# Altium PCB CM5_RP2040_MZM.PcbDoc (part 1 of 5)
Units mil, origin at the board's own origin, x right, y up, seen from the top; angles counter-clockwise.
Board outline 4724.41 x 3543.31 mil, 4 copper layers (Top Layer, GND L2, GND L3, Bottom Layer), stack 62.992 mil thick; 227 components, 122 nets, 905 pads, 3083 vias.
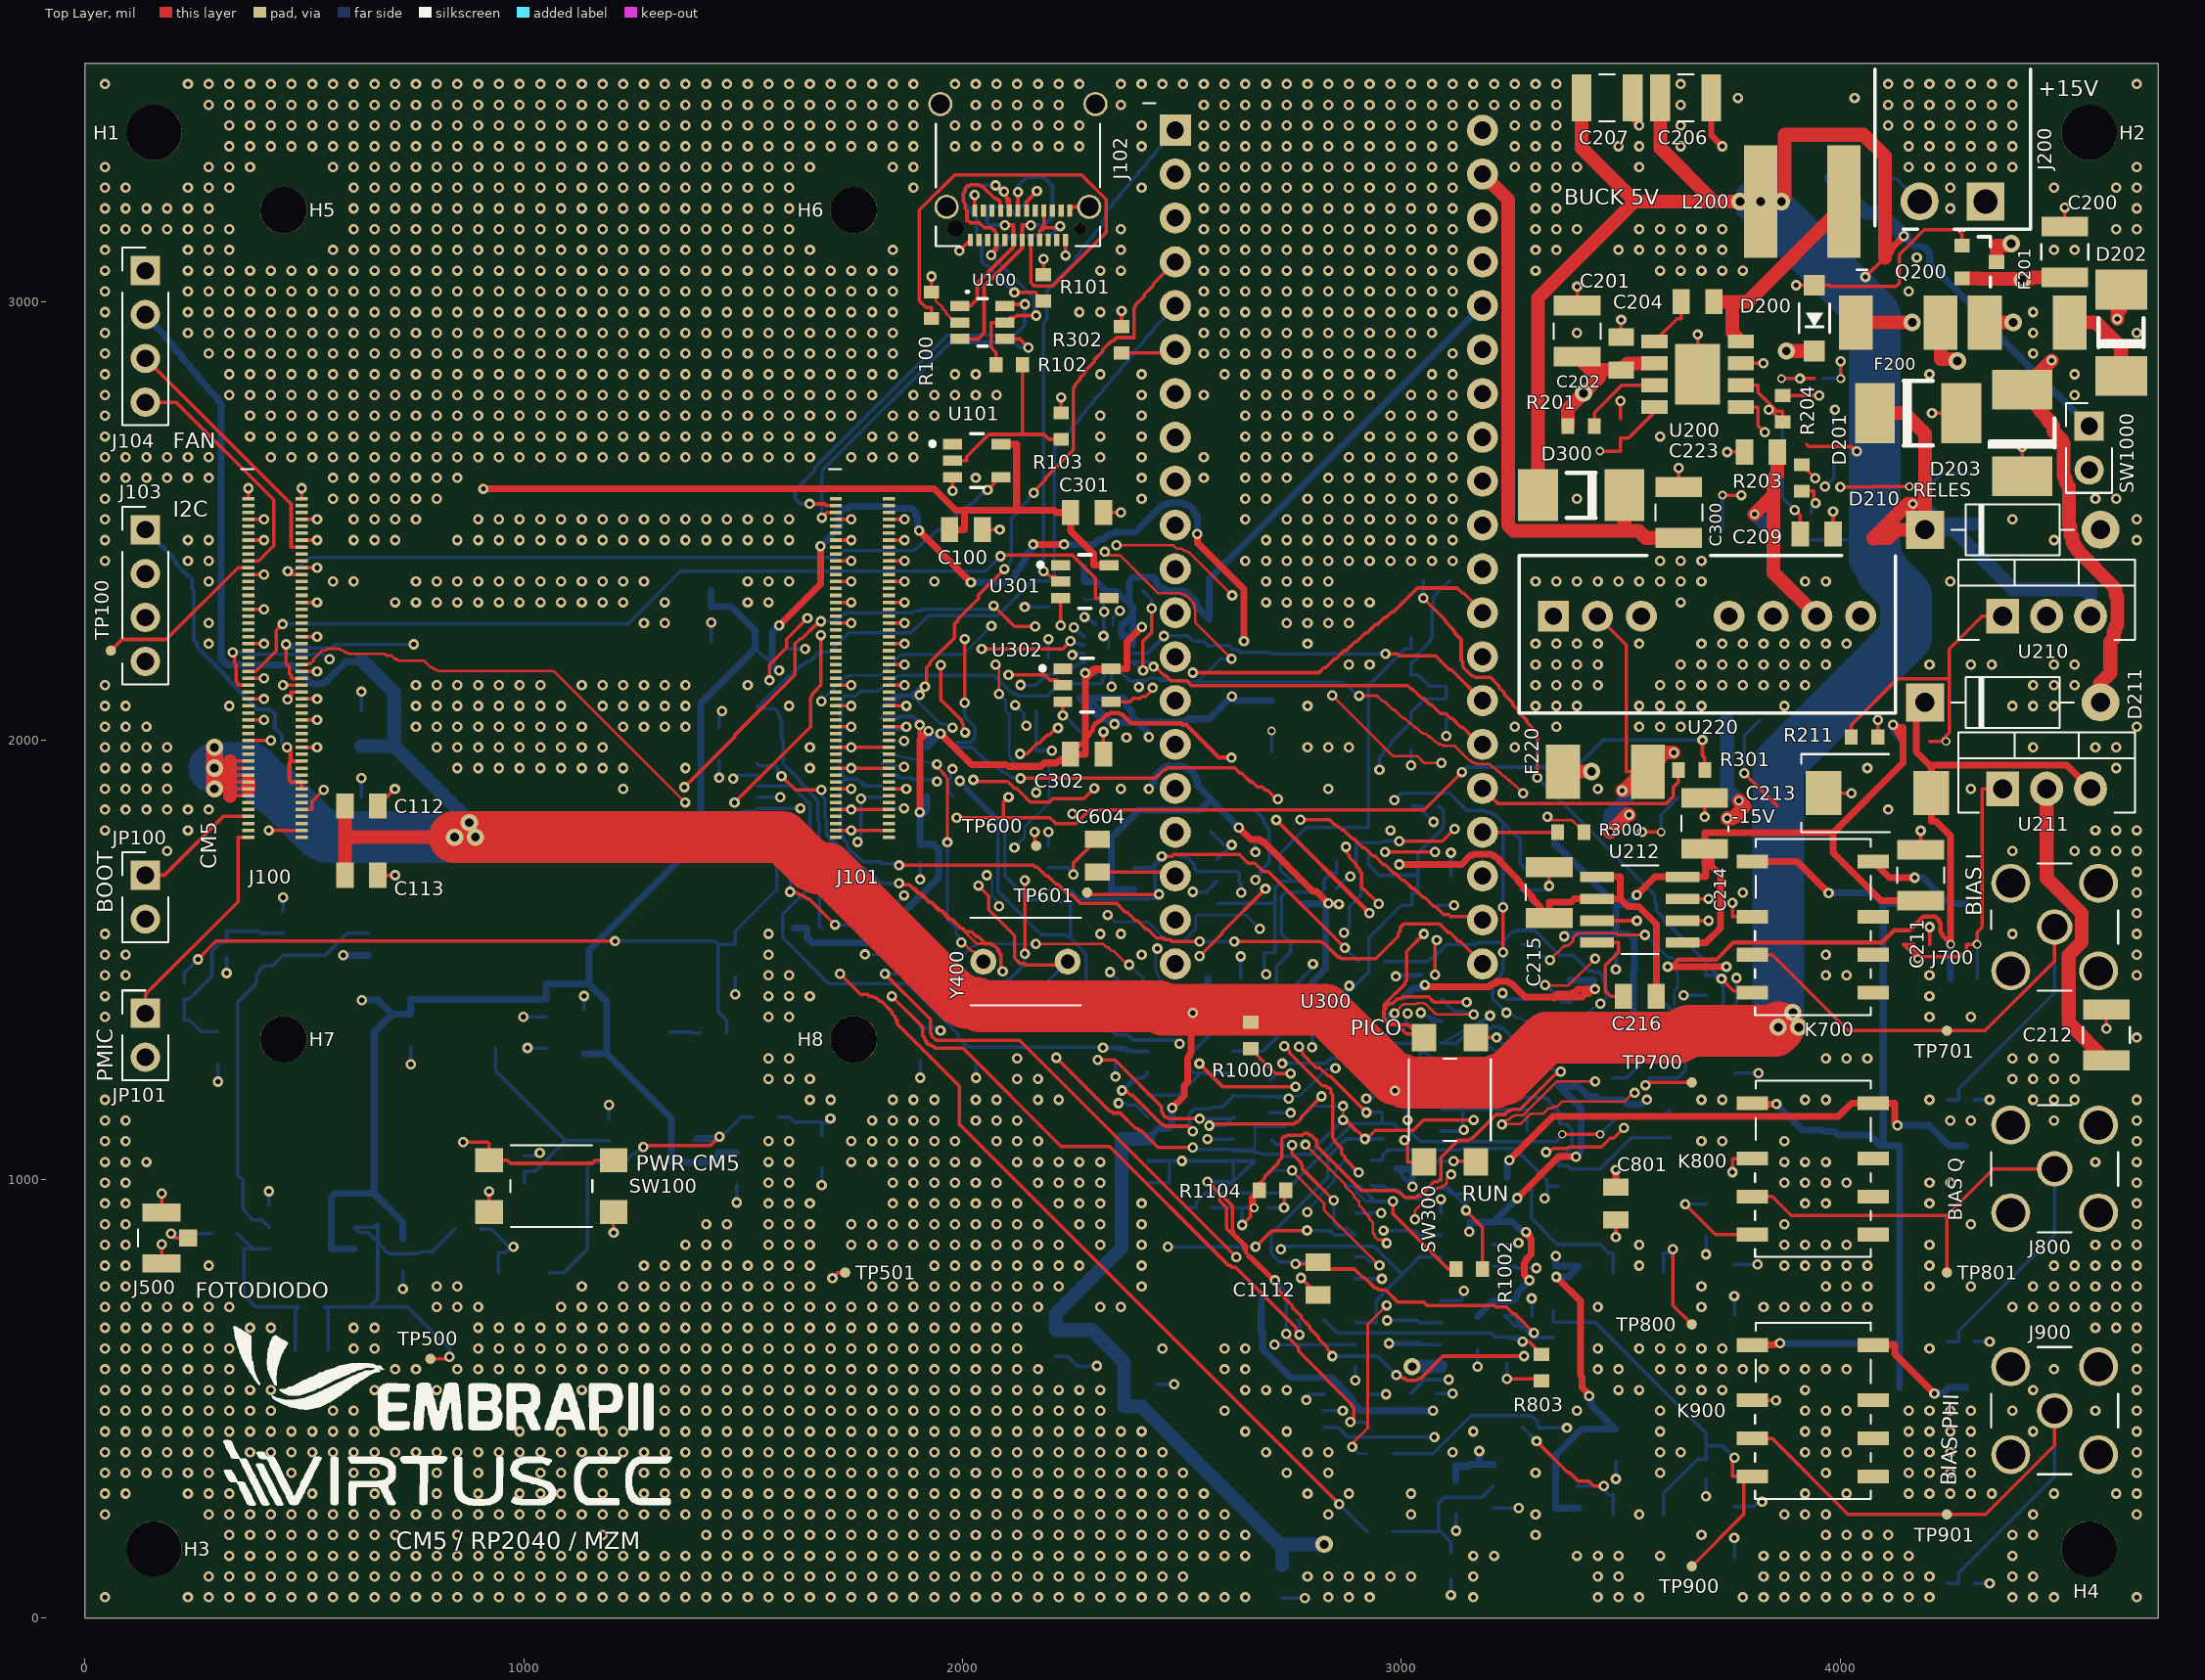
[diagram p0: Top Layer view]
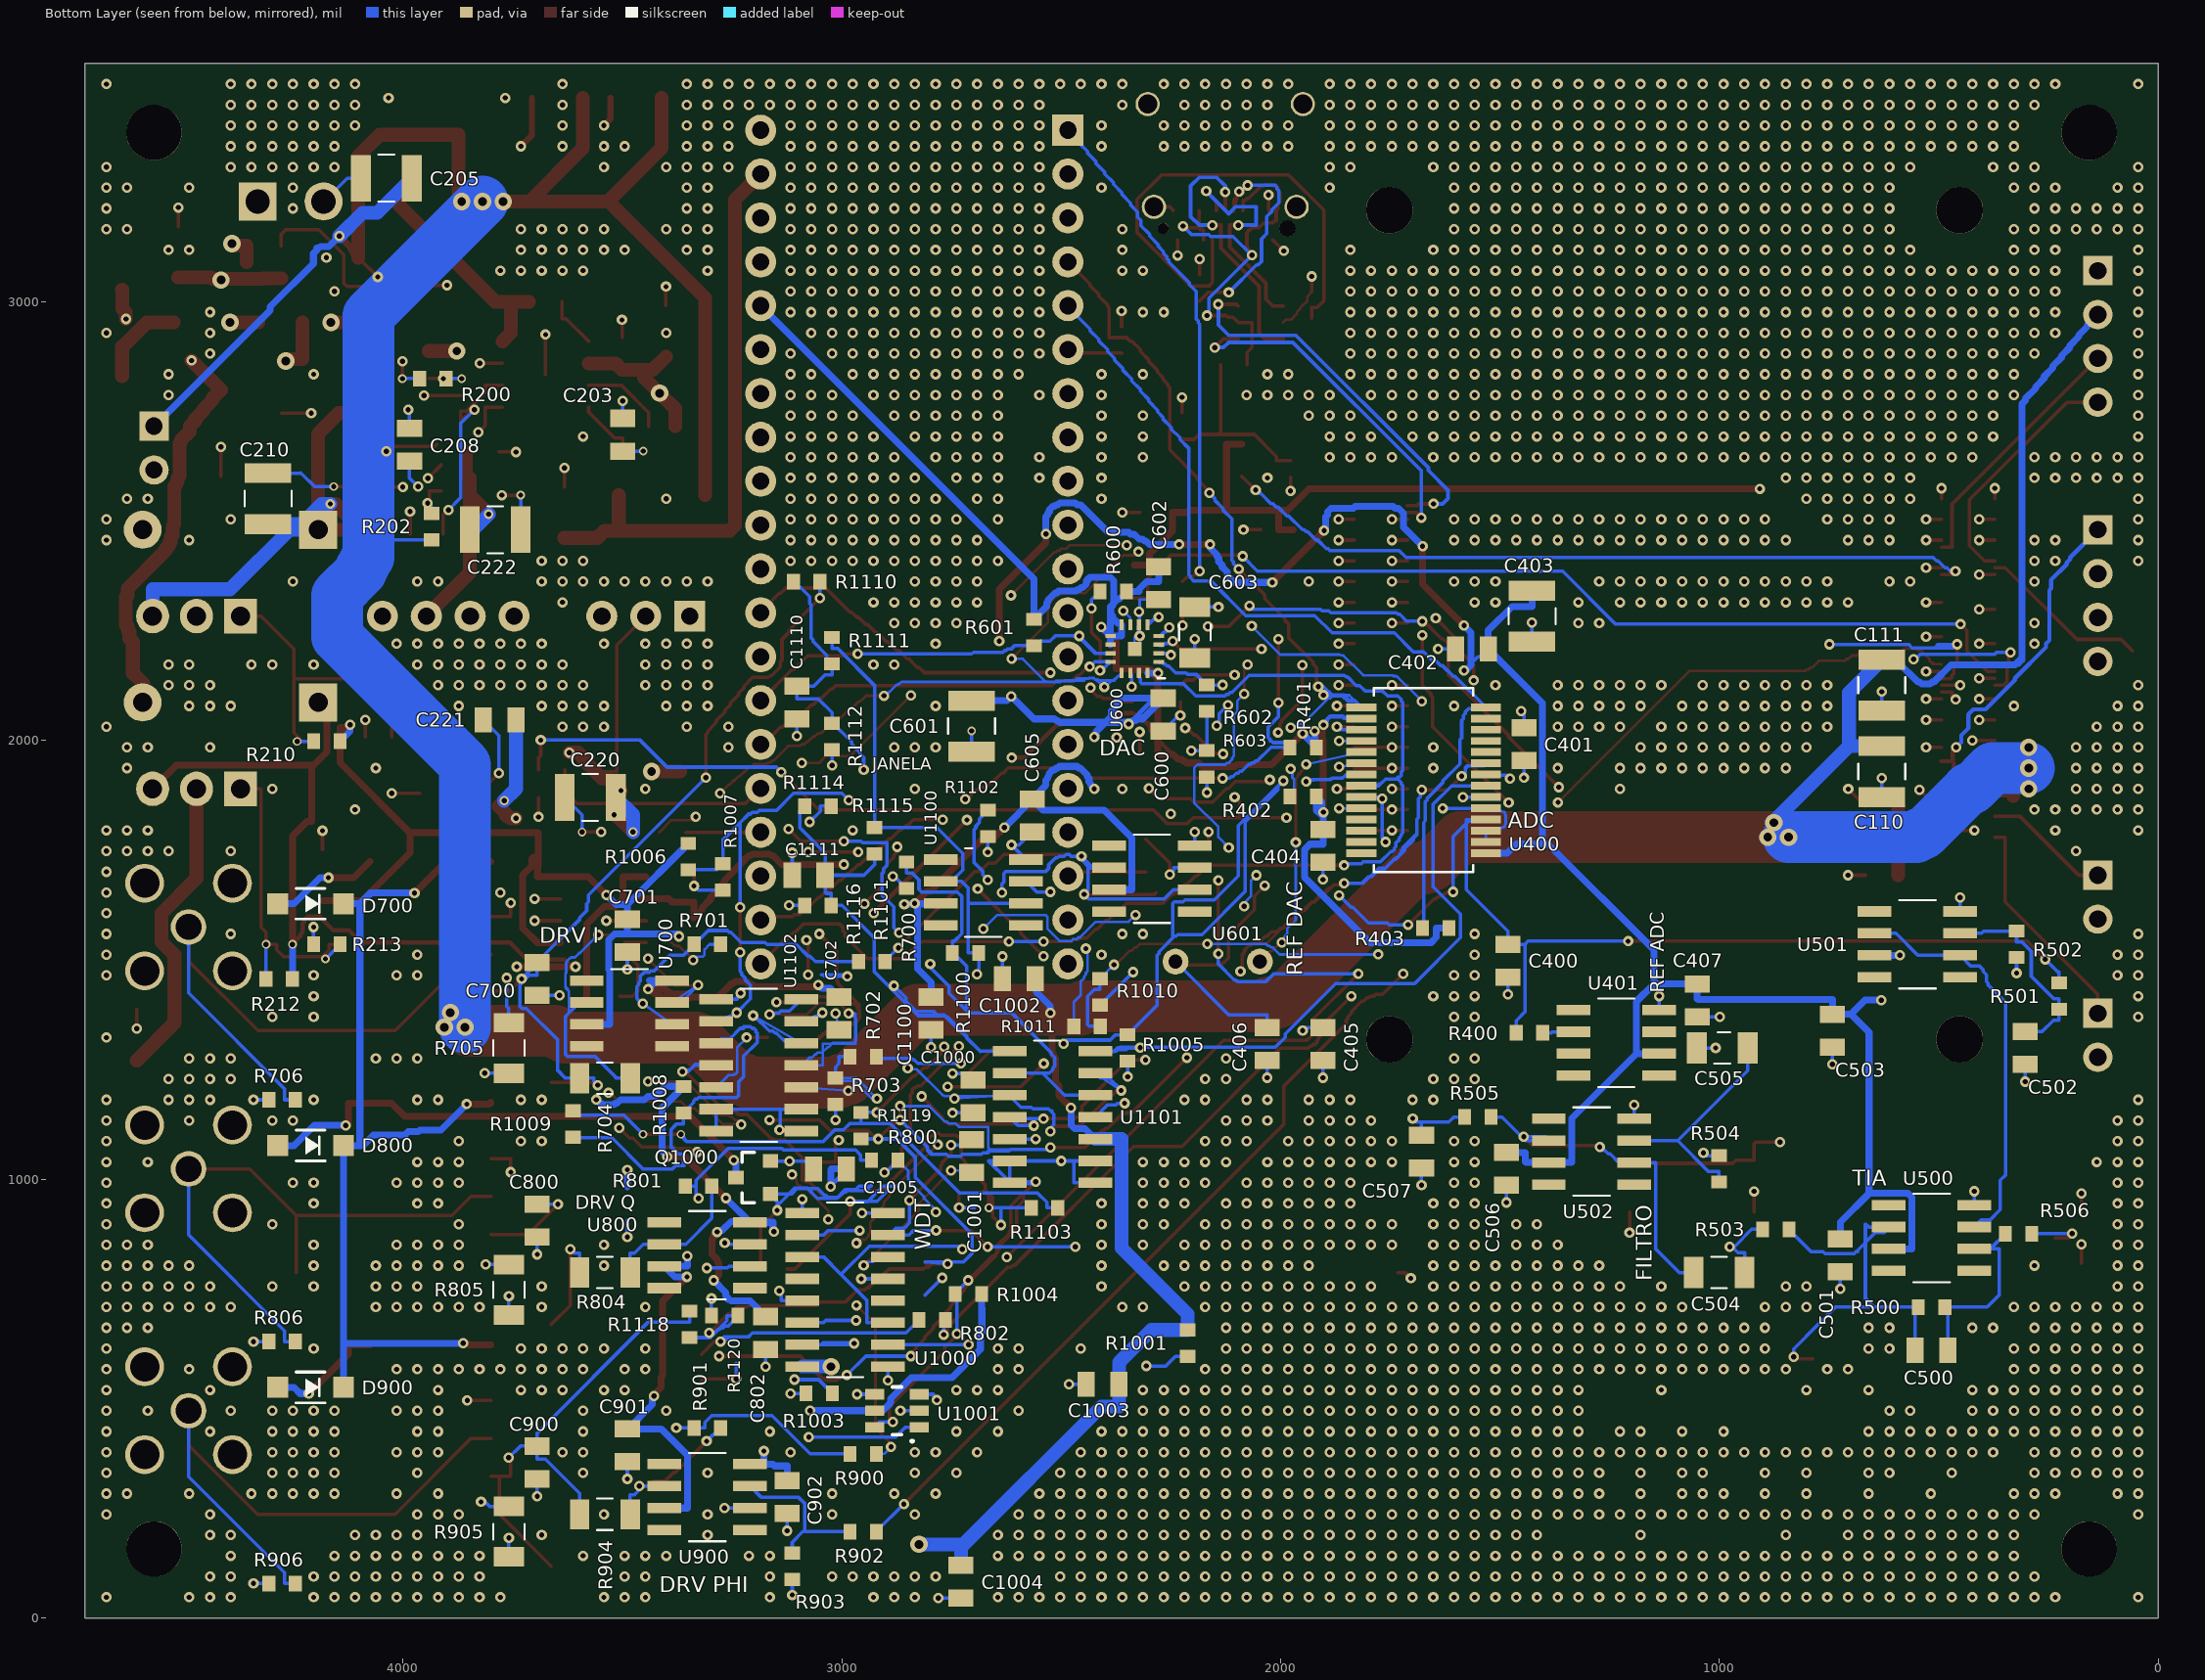
[diagram p1: Bottom Layer view, seen from below]
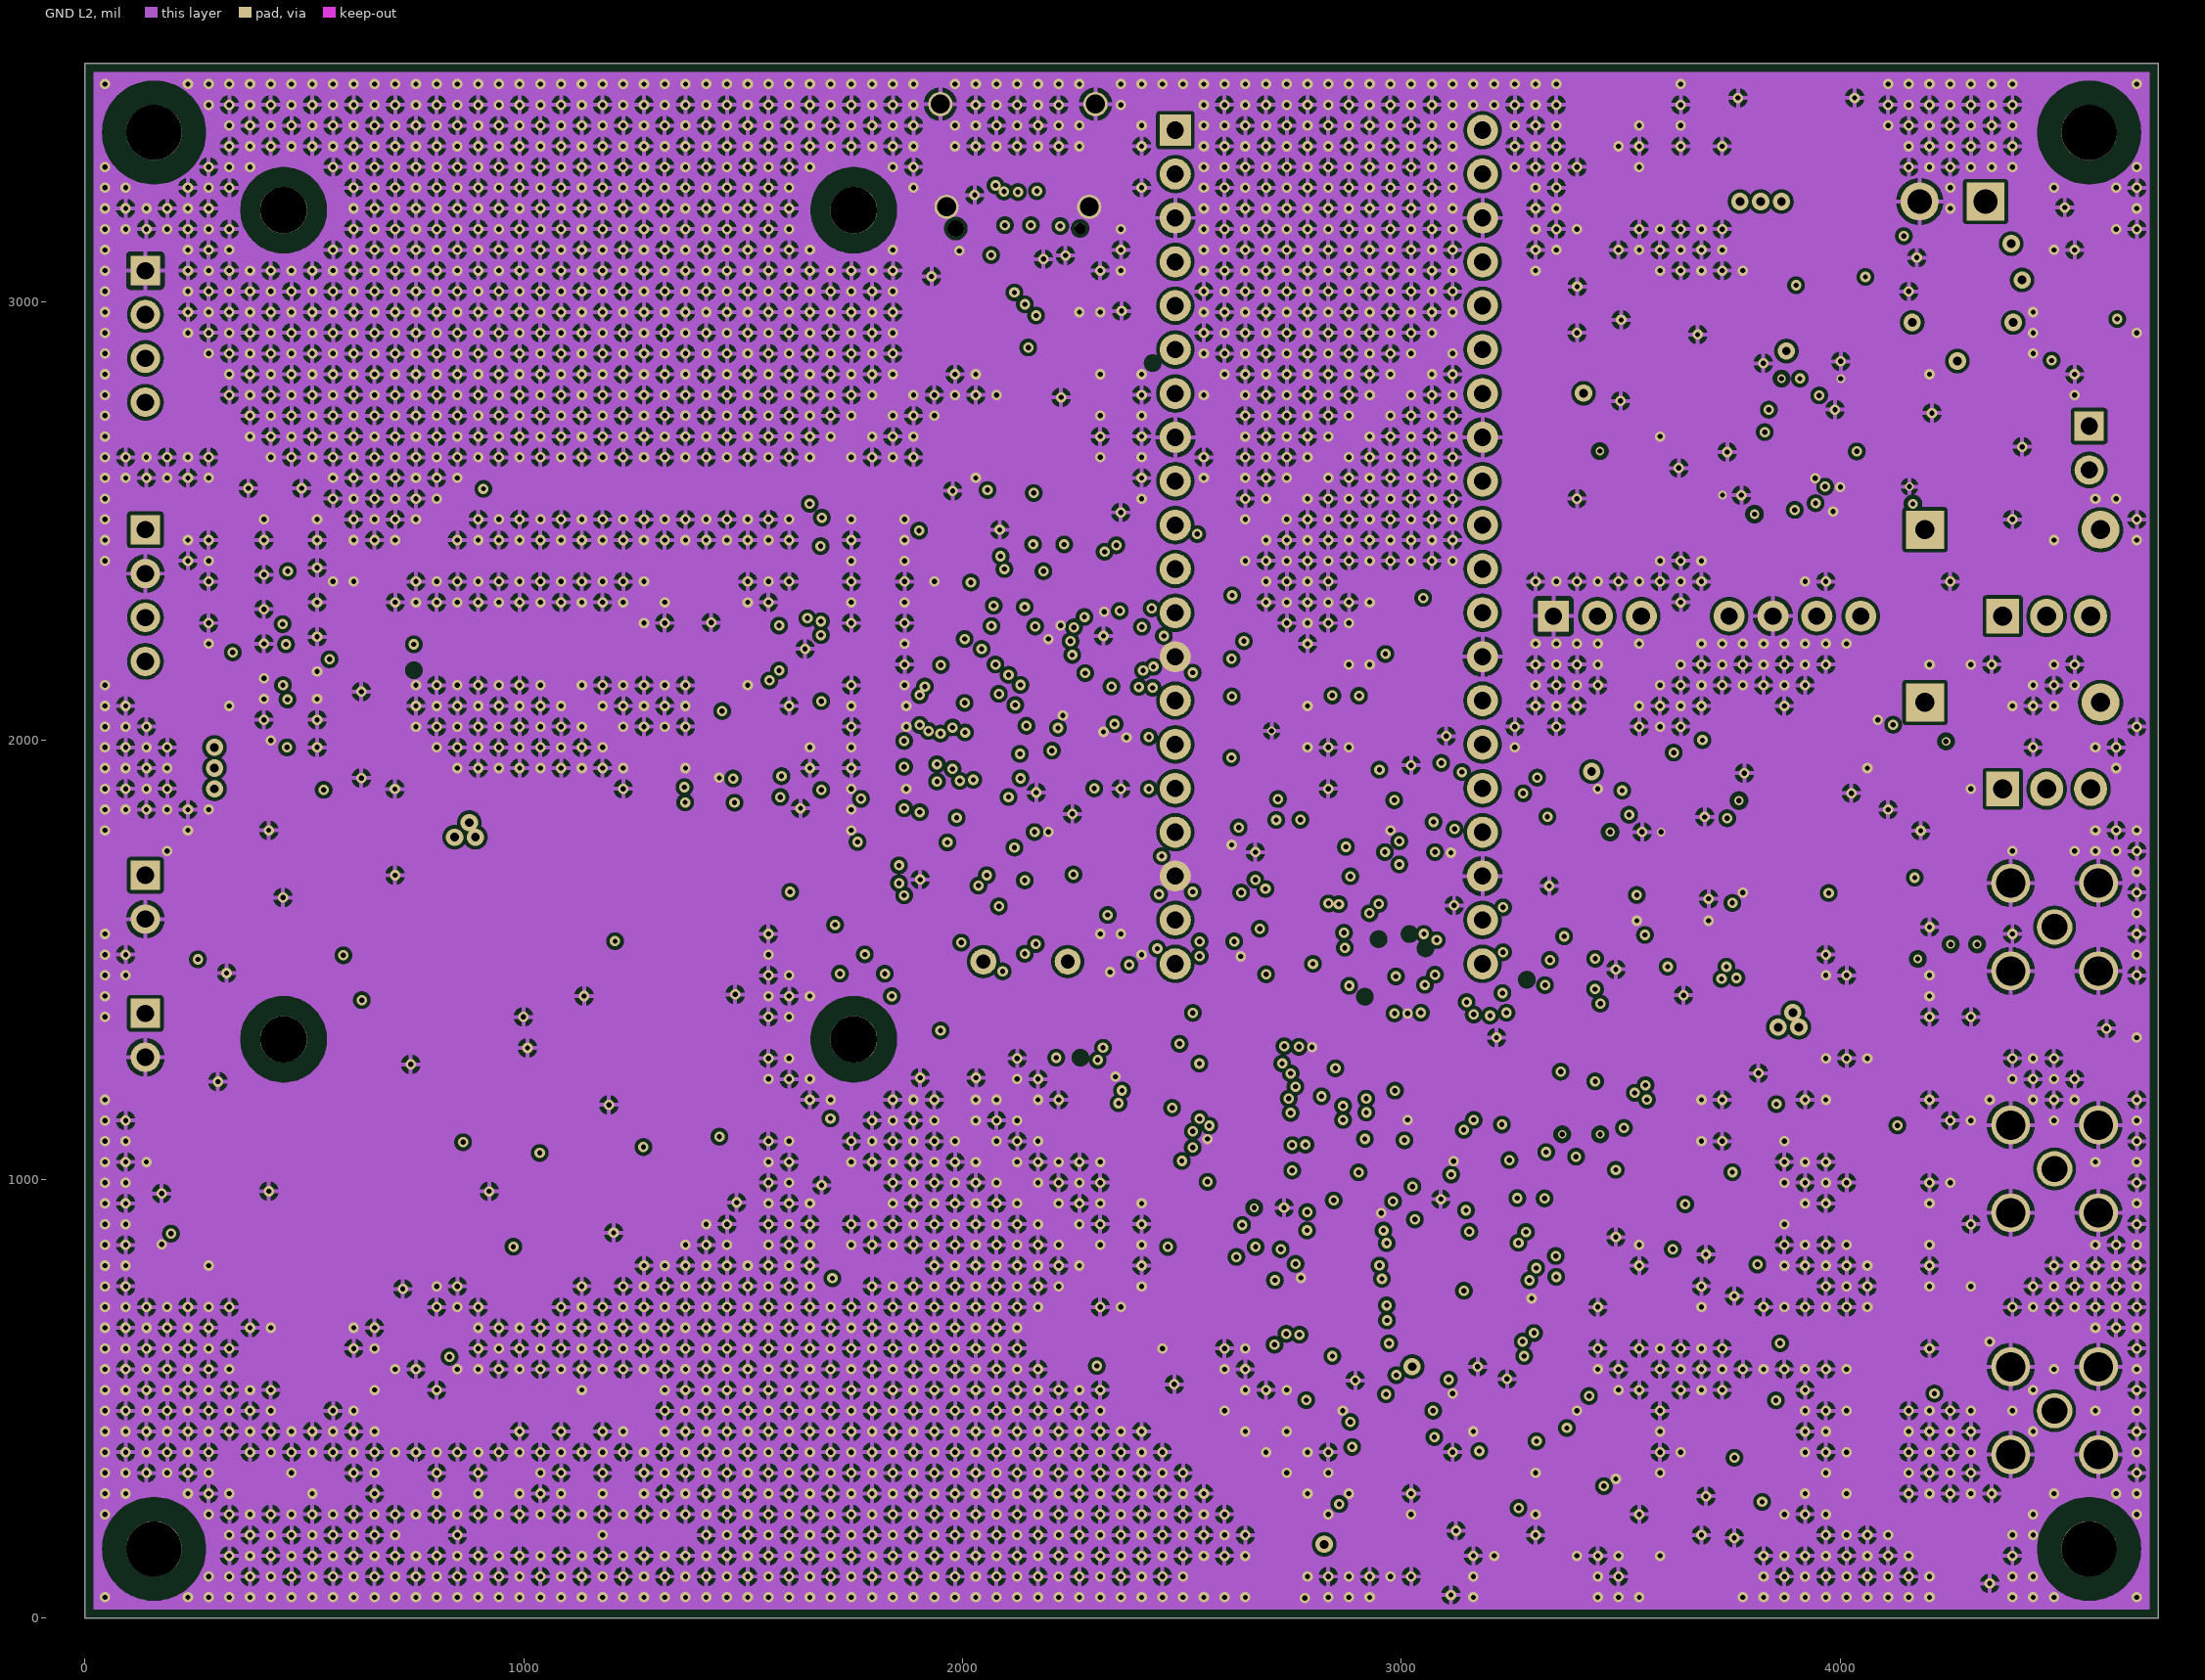
[diagram p2: GND L2]
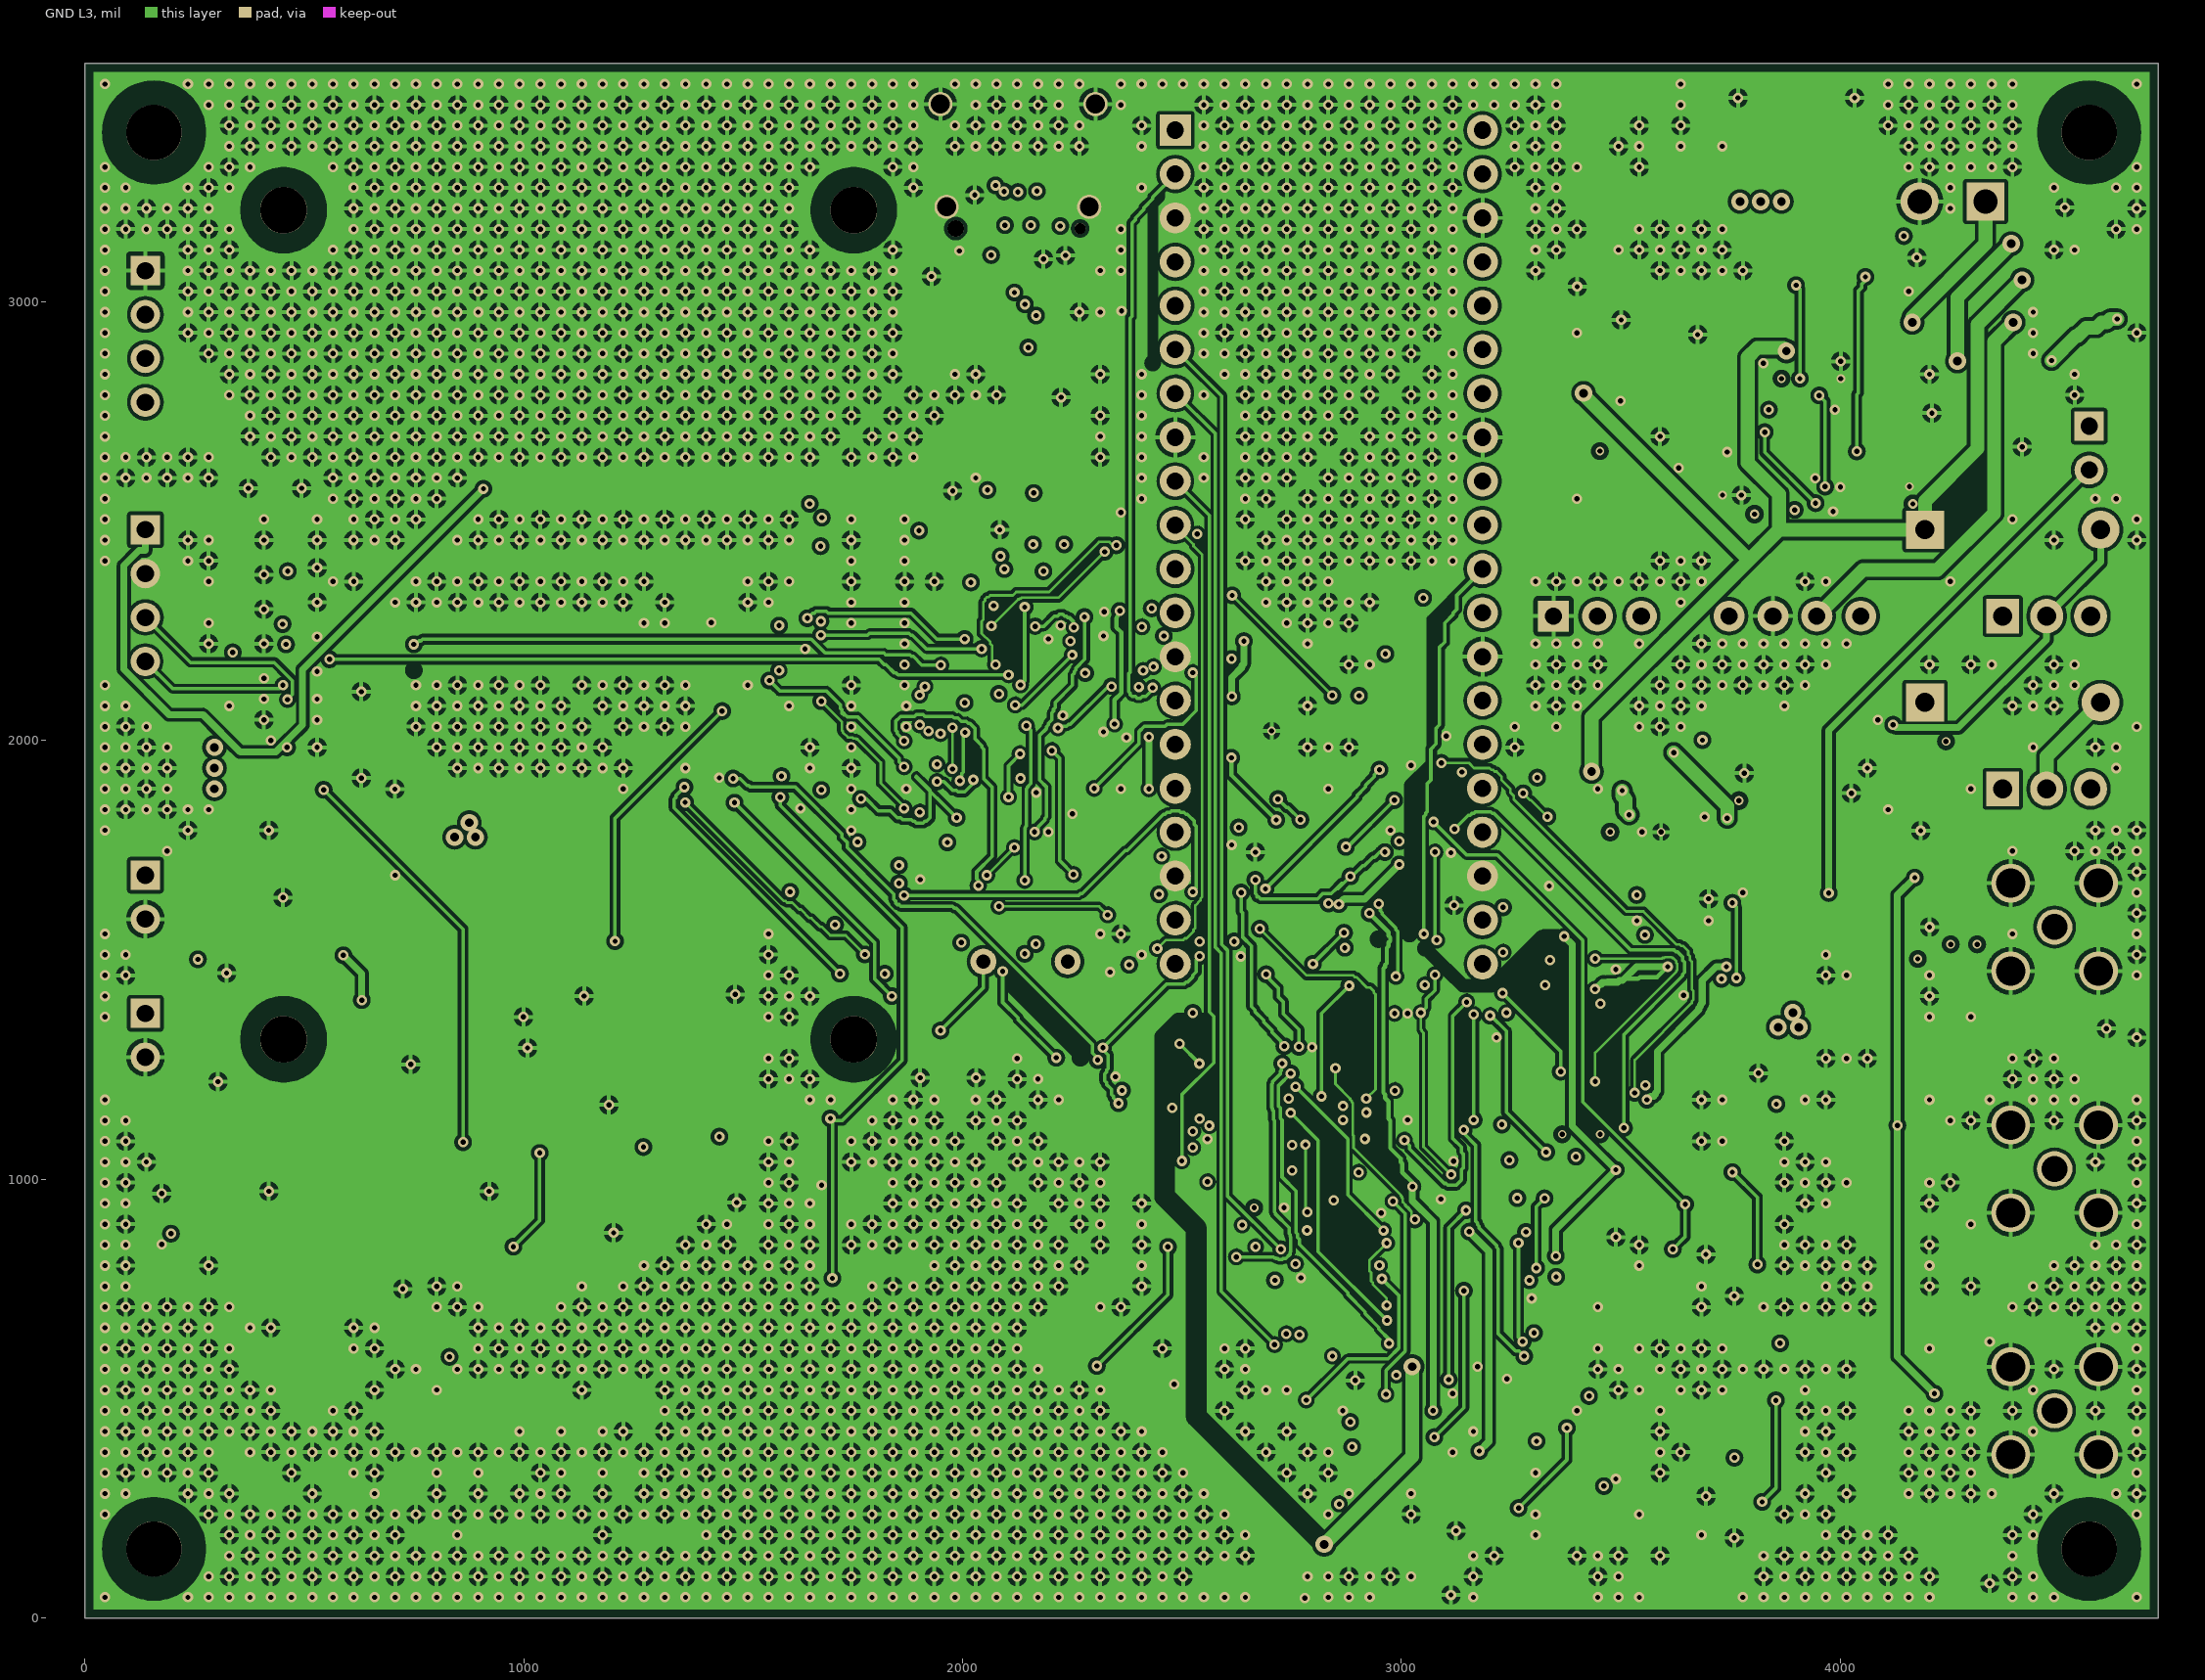
[diagram p3: GND L3]

## Layer stack, top to bottom
Top Solder: solder mask 0.4, Solder Resist, Dk 3.5
Top Layer: signal copper 1.378
Prepreg L1-L2: dielectric 5.9055, FR-4, Dk 4.2
GND L2: signal copper 1.378
Dielectric 1: dielectric 45.6693, FR-4, Dk 4.2
GND L3: signal copper 1.378
Prepreg L3-L4: dielectric 5.9055, FR-4, Dk 4.2
Bottom Layer: signal copper 1.378
Bottom Solder: solder mask 0.4, Solder Resist, Dk 3.5

## Board outline
0,3543.31 4724.41,3543.31 4724.41,0 0,0

## Design rules (kind name [scope] priority, off if disabled: settings)
Clearance Clearance_0_15mm [All] p1: gap=5.91 ignorepadtopadclearanceinfootprint=TRUE
DiffPairsRouting USB_R8_022_018 [InDifferentialPair('USB_CM5') Or InDifferentialPair('USB_EXT')] p1: maxlimit=8.66 minlimit=5.91 mostfreqgap=7.09 toplayer_minwidth=8.66 toplayer_maxwidth=8.66 toplayer_prefwidth=8.66 midlayer1_minwidth=8.66 midlayer1_maxwidth=8.66 midlayer1_prefwidth=8.66 midlayer2_minwidth=8.66 midlayer2_maxwidth=8.66 midlayer2_prefwidth=8.66 bottomlayer_minwidth=8.66 bottomlayer_maxwidth=8.66 bottomlayer_prefwidth=8.66 maxuncoupledlength=500
HoleSize Hole_Mounting_NPTH [IsPad And (PadIsPlated = 'False') And (AsMM(HoleSize) > 2.54)] p1: absolutevalues=TRUE maxlimit=126.02 minlimit=106.26 maxpercent=100.000 minpercent=0.000 // R6
HoleSize Hole_Default [Not (IsPad And (PadIsPlated = 'False') And (AsMM(HoleSize) > 2.54))] p2: absolutevalues=TRUE maxlimit=100 minlimit=1 maxpercent=80.000 minpercent=20.000 // R6
MinimumSolderMaskSliver Mask_FinePitch_010mm [InComponent('J100') OR InComponent('J101') OR InComponent('J102') OR InComponent('U400') OR InComponent('U600')] p1: minsoldermaskwidth=3.94 // R6
MinimumSolderMaskSliver Mask_Default_0254mm [All] p2: minsoldermaskwidth=10 // R6
PolygonConnect [All] p1: connectstyle=Relief reliefconductorwidth=10 reliefentries=4 polygonreliefangle="90 Angle" airgapwidth=10
RoutingVias Via_060_030 [All] p1: holewidth=11.81 width=23.62 viastyle="Through Hole" minholewidth=9.84 minwidth=21.65 maxholewidth=23.62 maxwidth=47.24
SolderMaskExpansion Mask_Vias_Tented [IsVia] p1: expansion=-39.37 istentingtop=TRUE // R6
SolderMaskExpansion [All] p2: expansion=4 istentingtop=FALSE
Width Width_Default [All] p1: maxlimit=196.85 minlimit=5.91 preferedwidth=7.87
27 further rules are at their usual default settings.

## Classes and differential pairs
differential pair USB_CM5: +CM5_USB_P -CM5_USB_N
differential pair USB_EXT: +USB_DP_EXT -USB_DN_EXT

## Components (designator, comment, footprint, x,y, rotation, side; value= is the part's Value field where it differs from the comment)
C100 "100 nF / 50 V X7R" C0805#1 2007.87,2480.31 r0 top
C110 "47 uF / 10 V X7R" C1210#1 629.92,1929.13 r90 bottom
C111 "47 uF / 10 V X7R" C1210#1 629.92,2125.98 r90 bottom
C112 "100 nF / 50 V X7R" C0805#1 629.92,1850.39 r0 top
C113 "100 nF / 50 V X7R" C0805#1 629.92,1692.91 r0 top
C200 "10 uF / 50 V X7R" C1210#2 4511.42,3113.39 r90 top
C201 "10 uF / 50 V X7R" C1210#2 3400.39,2933.07 r90 top
C202 "100 nF / 50 V X7R" C0805#1 3500.59,2881.89 r90 top
C203 "10 nF / 50 V X7R" C0805#2 3499.21,2696.85 r270 bottom
C204 "100 nF / 50 V X7R" C0805#1 3674.8,3000 r0 top
C205 "22 uF / 25 V X7R" C1210#1 4037.4,3281.5 r180 bottom
C206 "22 uF / 25 V X7R" C1210#2 3647.64,3464.57 r0 top
C207 "22 uF / 25 V X7R" C1210#2 3468.5,3464.57 r0 top
C208 "2.7 nF / 50 V C0G" C0805#2 3984.65,2674.02 r270 bottom
C209 "33 pF / 50 V C0G" C0805#1 3946.06,2470.47 r0 top
C210 "10 uF / 50 V X7R" C1210#1 4307.09,2551.18 r270 bottom
C211 "10 uF / 50 V X7R" C1210#2 4183.07,1692.91 r90 top
C212 "10 uF / 50 V X7R" C1210#2 4606.3,1328.74 r90 top
C213 "10 uF / 35 V tantalum" TANT_D 4084.65,1879.92 r0 top
C214 "10 uF / 50 V X7R" C1210#2 3690.94,1811.02 r90 top
C215 "10 uF / 50 V X7R" C1210#2 3336.61,1653.54 r90 top
C216 "10 nF / 50 V C0G" C0805#1 3543.31,1417.32 r0 top
C220 "Comment" C1210#1 3572.83,1870.08 r180 bottom
C221 "Comment" C0805#2 3779.53,2047.24 r180 bottom
C222 "Comment" C1210#1 3789.37,2480.31 r180 bottom
C223 "Comment" C0805#1 3818.9,2657.48 r0 top
C300 "10 uF / 50 V X7R" C1210#2 3631.89,2519.68 r90 top
C301 "100 nF / 50 V X7R" C0805#1 2283.46,2519.68 r0 top
C302 "100 nF / 50 V X7R" C0805#1 2283.46,1968.5 r0 top
C400 "1 uF / 25 V X7R" C0805#2 1481.81,1498.03 r90 bottom
C401 "100 nF / 50 V X7R" C0805#2 1445.45,1991.73 r90 bottom
C402 "100 nF / 50 V X7R" C0805#2 1564.13,2208.66 r180 bottom
C403 "10 uF / 50 V X7R" C1210#1 1426.93,2283.46 r90 bottom
C404 "100 nF / 50 V X7R" C0805#2 1903.27,1759.84 r90 bottom
C405 "27 pF / 50 V C0G" C0805#2 1903.27,1308.07 r90 bottom
C406 "27 pF / 50 V C0G" C0805#2 2030.63,1308.07 r90 bottom
C407 "100 nF / 50 V X7R" C0805#2 1050.51,1407.48 r90 bottom
C500 "100 pF / 50 V C0G" C0805#2 516.54,610.24 r180 bottom
C501 "100 nF / 50 V X7R" C0805#2 724.41,826.77 r90 bottom
C502 "1 uF / 25 V X7R" C0805#2 303.15,1299.21 r90 bottom
C503 "100 nF / 50 V X7R" C0805#2 742.52,1338.58 r90 bottom
C504 "100 nF / 50 V C0G" C1206 1000.79,787.4 r180 bottom
C505 "47 nF / 50 V C0G" C1206 993.7,1299.21 r180 bottom
C506 "100 nF / 50 V X7R" C0805#2 1485.04,1023.62 r90 bottom
C507 "10 nF / 50 V C0G" C0805#2 1678.74,1062.99 r90 bottom
C600 "100 nF / 50 V X7R" C0805#2 2267.46,2059.05 r90 bottom
C601 "10 uF / 50 V X7R" C1210#1 2704.06,2032.68 r90 bottom
C602 "100 nF / 50 V X7R" C0805#2 2277.6,2358.27 r90 bottom
C603 "150 nF / 50 V X7R" C1206 2195.28,2246.06 r90 bottom
C604 "1 uF / 25 V X7R" C0805#1 2306.85,1737.8 r270 top
C605 "100 nF / 50 V X7R" C0805#2 2566.02,1828.74 r90 bottom
C700 "1 uF / 25 V X7R" C0805#2 3693.7,1456.69 r90 bottom
C701 "100 nF / 50 V X7R" C0805#2 3488.39,1555.12 r90 bottom
C702 "100 nF / 50 V X7R" C0805#2 3006.1,1377.95 r90 bottom
C800 "1 uF / 25 V X7R" C0805#2 3693.7,905.51 r90 bottom
C801 "100 nF / 50 V X7R" C0805#1 3488.39,944.88 r270 top
C802 "100 nF / 50 V X7R" C0805#2 3173.43,649.61 r90 bottom
C900 "1 uF / 25 V X7R" C0805#2 3693.7,354.33 r90 bottom
C901 "100 nF / 50 V X7R" C0805#2 3488.39,393.7 r90 bottom
C902 "100 nF / 50 V X7R" C0805#2 3124.21,275.59 r90 bottom
C1000 "1 uF / 25 V X7R" C0805#2 2700.39,1188.58 r90 bottom
C1001 "1 uF / 25 V X7R" C0805#2 2703.84,1053.15 r90 bottom
C1002 "100 nF / 50 V X7R" C0805#2 2596.46,1456.69 r180 bottom
C1003 "100 nF / 50 V X7R" C0805#2 2405.51,532.48 r180 bottom
C1004 "100 nF / 50 V X7R" C0805#2 2728.35,82.68 r90 bottom
C1005 "100 nF / 50 V X7R" C0805#2 3026.87,1023.62 r180 bottom
C1100 "100 nF / 50 V X7R" C0805#2 2796.06,1377.95 r90 bottom
C1110 "1 nF / 50 V C0G" C0805#2 3101.97,2086.61 r90 bottom
C1111 "1 nF / 50 V C0G" C0805#2 3075.2,1692.91 r180 bottom
C1112 "1 nF / 50 V C0G" C0805#1 2809.84,773.62 r270 top
D200 "BZT52C12 / zener 12 V" SOD-123#1 3940.94,2962.6 r90 top
D201 "SMBJ18A / TVS" DO-214AA 4177.17,2746.25 r0 top
D202 "B340A / 3 A 40 V" DO-214AC 4639.76,2929.13 r90 top
D203 "SMBJ18A / TVS" DO-214AA 4414.38,2700.79 r90 top
D210 "1N4007" D_DO41_P10 4192.91,2480.31 r0 top
D211 "1N4007" D_DO41_P10 4192.91,2086.61 r0 top
D300 "SS14" DO-214AC 3409.55,2559.05 r180 top
D700 "1N4148W / flyback" SOD-123#2 4210.24,1627.95 r180 bottom
D800 "1N4148W / flyback" SOD-123#2 4210.24,1076.76 r180 bottom
D900 "1N4148W / flyback" SOD-123#2 4210.24,525.58 r180 bottom
F200 "T3 A / 125 V" FUSE_NANO2 4131.89,2952.76 r0 top
F201 "F250 mA / 125 V" FUSE_NANO2 4425.79,2952.76 r0 top
F220 "Comment" FUSE_NANO2 3464.57,1929.13 r0 top
H1 "M3 NPTH" NPTH_M3_3.2mm 157.48,3385.83 r0 top
H2 "M3 NPTH" NPTH_M3_3.2mm 4566.93,3385.83 r0 top
H3 "M3 NPTH" NPTH_M3_3.2mm 157.48,157.48 r0 top
H4 "M3 NPTH" NPTH_M3_3.2mm 4566.93,157.48 r0 top
H5 "CM5 M2.5 NPTH" NPTH_CM5_M2.5_2.7mm 452.76,3208.66 r0 top
H6 "CM5 M2.5 NPTH" NPTH_CM5_M2.5_2.7mm 1751.97,3208.66 r0 top
H7 "CM5 M2.5 NPTH" NPTH_CM5_M2.5_2.7mm 452.76,1318.9 r0 top
H8 "CM5 M2.5 NPTH" NPTH_CM5_M2.5_2.7mm 1751.97,1318.9 r0 top
J100 "CM5 carrier / 100 vias" CM5_BERG100 433.07,2165.35 r0 top
J101 "CM5 carrier / 100 vias" CM5_BERG100 1771.65,2165.35 r0 top
J102 "USB-C / 12401610E4#2A" USB_C_12401610 2125.98,3338.58 r180 top
J103 "I2C / display opcional" HDR_1X04_P254 137.8,2480.31 r0 top
J104 "FAN / 5 V" HDR_1X04_P254 137.8,3070.87 r0 top
J200 "5444262 / 2 vias" 5444262 4330.71,3228.35 r180 top
J500 "U.FL / sinal eletrico" HIROSE_UFL 193.5,866.14 r180 top
J700 "SMA / DC BIAS" SMA_132134 4488.19,1574.8 r0 top
J800 "SMA / DC BIAS" SMA_132134 4488.19,1023.62 r0 top
J900 "SMA / DC BIAS" SMA_132134 4488.19,472.44 r0 top
JP100 "BOOT / ABERTO" HDR_1X02_P254 137.8,1692.91 r0 top
JP101 "KILL / ABERTO" HDR_1X02_P254 137.8,1377.95 r0 top
K700 "G6K-2F-Y DC5" G6K_2F_Y 3937.01,1574.8 r0 top
K800 "G6K-2F-Y DC5" G6K_2F_Y 3937.01,1023.62 r0 top
K900 "G6K-2F-Y DC5" G6K_2F_Y 3937.01,472.44 r0 top
L200 "3.3 uH / XAL7070-332MEC" XAL7070 3913.39,3228.35 r180 top
Q200 "DMP4065S-7" ONSC-SOT-23-3-318-08_V#1 4316.54,3090.55 r0 top
Q1000 "AO3400A" ONSC-SOT-23-3-318-08_V#2 3201.57,1003.94 r180 bottom
R100 "5.1k / 1%" R-0603#1 1929.13,2992.13 r90 top
R101 "5.1k / 1%" R-0603#1 2184.05,3031.5 r90 top
R102 "10k / 1%" R-0603#1 2106.3,2856.35 r0 top
R103 "100k / 1%" R-0603#1 2224.41,2716.54 r90 top
R200 "100k / 1%" R-0603#2 3931.5,2824.8 r180 bottom
R201 "100k / 1%" R-0603#1 3409.45,2716.54 r0 top
R202 "118k / 0.1%" R-0603#2 3934.25,2487.4 r270 bottom
R203 "22.1k / 0.1%" R-0603#1 3912.2,2598.43 r90 top
R204 "15.8k / 1%" R-0603#1 3868.5,2755.91 r90 top
R210 "120R / 0.1%" R-0603#2 4173.23,1998.03 r180 bottom
R211 "931R / 0.1%" R-0603#1 4055.12,2007.87 r0 top
R212 "120R / 0.1%" R-0603#2 4281.5,1456.69 r180 bottom
R213 "931R / 0.1%" R-0603#2 4173.23,1535.43 r180 bottom
R300 "33R / 1%" R-0603#1 3385.53,1790.94 r0 top
R301 "33R / 1%" R-0603#1 3661.12,1932.68 r0 top
R302 "47k / 1%" R-0603#1 2362.2,2913.39 r90 top
R400 "0R / jumper" R-0603#2 1433.03,1333.46 r180 bottom
R401 "10k / 1%" R-0603#2 1948.31,1984.25 r180 bottom
R402 "10k / 1%" R-0603#2 1948.31,1872.05 r180 bottom
R403 "10k / 1%" R-0603#2 1646.46,1572.83 r180 bottom
R500 "220k / 0.1%" R-0603#2 516.54,708.66 r180 bottom
R501 "90.9k / 0.1%" R-0603#2 225.98,1417.32 r90 bottom
R502 "10.0k / 0.1%" R-0603#2 322.83,1535.43 r90 bottom
R503 "10.0k / 1%" R-0603#2 871.65,885.83 r180 bottom
R504 "10.0k / 1%" R-0603#2 1000.79,1023.62 r90 bottom
R505 "100R / 1%" R-0603#2 1550.41,1141.73 r180 bottom
R506 "Comment" R-0603#2 318.11,875.98 r180 bottom
R600 "10k / 1%" R-0603#2 2381.1,2339.57 r180 bottom
R601 "10k / 1%" R-0603#2 2561.85,2246.06 r90 bottom
R602 "10.0k / 0.1%" R-0603#2 2167.83,2096.46 r90 bottom
R603 "10.0k / 0.1%" R-0603#2 2167.83,1946.85 r90 bottom
R700 "10.0k / 0.1%" R-0603#2 2931.5,1496.06 r180 bottom
R701 "63.4k / 0.1%" R-0603#2 3306.3,1535.43 r180 bottom
R702 "10.0k / 0.1%" R-0603#2 2951.18,1279.53 r180 bottom
R703 "63.4k / 0.1%" R-0603#2 3014.17,1200.79 r90 bottom
R704 "220R / 1% / 0.667 W" R1206 3539.57,1230.31 r180 bottom
R705 "1k / 1% / 0.25 W" R1206 3758.27,1299.21 r90 bottom
R706 "1M / 1%" R-0603#2 4274.8,1181.1 r180 bottom
R800 "10.0k / 0.1%" R-0603#2 2901.97,1043.31 r180 bottom
R801 "63.4k / 0.1%" R-0603#2 3325.98,984.25 r180 bottom
R802 "10.0k / 0.1%" R-0603#2 2793.7,679.13 r180 bottom
R803 "63.4k / 0.1%" R-0603#1 3319.29,570.87 r270 top
R804 "220R / 1% / 0.667 W" R1206 3539.57,787.4 r180 bottom
R805 "1k / 1% / 0.25 W" R1206 3758.27,748.03 r90 bottom
R806 "1M / 1%" R-0603#2 4274.8,629.92 r180 bottom
R900 "10.0k / 0.1%" R-0603#2 2951.18,374.02 r180 bottom
R901 "63.4k / 0.1%" R-0603#2 3306.3,433.07 r180 bottom
R902 "10.0k / 0.1%" R-0603#2 2951.18,196.85 r180 bottom
R903 "63.4k / 0.1%" R-0603#2 3112.6,118.11 r90 bottom
R904 "220R / 1% / 0.667 W" R1206 3539.57,236.22 r180 bottom
R905 "1k / 1% / 0.25 W" R1206 3758.27,196.85 r90 bottom
R906 "1M / 1%" R-0603#2 4274.8,78.74 r180 bottom
R1000 "1.00M / 1%" R-0603#1 2656.3,1327.56 r270 top
R1001 "1.00M / 1%" R-0603#2 2211.81,626.29 r90 bottom
R1002 "100R / 1%" R-0603#1 3154.33,795.28 r0 top
R1003 "100k / 1%" R-0603#2 3051.18,511.81 r180 bottom
R1004 "10k / 1%" R-0603#2 2711.42,738.19 r180 bottom
R1005 "47k / 1%" R-0603#2 2348.52,1299.21 r90 bottom
R1006 "56.0k / 0.1%" R-0603#2 3349.61,1735.43 r90 bottom
R1007 "10.0k / 0.1%" R-0603#2 3270.87,1688.98 r90 bottom
R1008 "113k / 0.1%" R-0603#2 3360.24,1181.1 r90 bottom
R1009 "10.0k / 0.1%" R-0603#2 3612.2,1125.98 r90 bottom
R1010 "47k / 1%" R-0603#2 2411.42,1427.17 r90 bottom
R1011 "1k / 1%" R-0603#2 2440.94,1348.43 r180 bottom
R1100 "11.0k / 0.1%" R-0603#2 2717.72,1515.75 r180 bottom
R1101 "78.7k / 0.1%" R-0603#2 2852.36,1692.91 r90 bottom
R1102 "11.0k / 0.1%" R-0603#2 2666.93,1811.02 r90 bottom
R1103 "10.0k / 0.1%" R-0603#2 2537.8,935.04 r180 bottom
R1104 "15.0k / 0.1%" R-0603#1 2706.3,974.41 r0 top
R1110 "80.6k / 0.1%" R-0603#2 3079.53,2362.2 r180 bottom
R1111 "20.0k / 0.1%" R-0603#2 3022.05,2204.72 r90 bottom
R1112 "26.7k / 0.1%" R-0603#2 3022.05,2008.86 r90 bottom
R1114 "80.6k / 0.1%" R-0603#2 3054.33,1850.39 r180 bottom
R1115 "20.0k / 0.1%" R-0603#2 2925.2,1771.65 r90 bottom
R1116 "26.7k / 0.1%" R-0603#2 3054.33,1624.02 r180 bottom
R1118 "80.6k / 0.1%" R-0603#2 3346.46,669.29 r90 bottom
R1119 "20.0k / 0.1%" R-0603#2 2955.91,1122.05 r90 bottom
R1120 "26.7k / 0.1%" R-0603#2 3266.54,688.98 r180 bottom
SW100 "POWER / botao NA" SW_TL3305A 1062.99,984.25 r0 top
SW300 "RESET / botao NA" SW_TL3305A 3110.24,1181.1 r90 top
SW1000 "ARM FISICO / ABERTO" HDR_1X02_P254 4566.93,2716.54 r0 top
TP100 "TESTPOINT" TP06R 59.05,2204.72 r0 top
TP500 "TESTPOINT" TP06R 787.4,590.55 r0 top
TP501 "Comment" TP06R 1732.28,787.4 r0 top
TP600 "TESTPOINT" TP06R 2167.83,1759.84 r0 top
TP601 "TESTPOINT" TP06R 2283.46,1653.54 r0 top
TP700 "TESTPOINT" TP06R 3661.42,1220.47 r0 top
TP701 "TESTPOINT" TP06R 4242.52,1338.58 r0 top
TP800 "TESTPOINT" TP06R 3661.42,669.29 r0 top
TP801 "TESTPOINT" TP06R 4242.52,787.4 r0 top
TP900 "TESTPOINT" TP06R 3661.42,118.11 r0 top
TP901 "TESTPOINT" TP06R 4242.52,236.22 r0 top
U100 "USBLC6-2SC6" SOT26#1 2045.28,2952.76 r180 top
U101 "SN74LVC1G17DBVR" FP-C04-091-OT-MFG 2032.48,2637.8 r0 top
U200 "AP64501SP-13" AP64501_SO8EP 3674.8,2834.65 r0 top
U210 "LM317T" TO220_3 4370.08,2283.46 r0 top
U211 "LM337T" TO220_3 4370.08,1889.76 r0 top
U212 "LT1763CS8-5#PBF" SOIC8#1 3543.31,1614.17 r0 top
U220 "Comment" TMR3_SIP8_15V 3346.46,2283.46 r0 top
U300 "Raspberry Pi Pico / SC0915" PICO_TH40 2834.65,2440.94 r0 top
U301 "SN74LVC1G17DBVR" FP-C04-091-OT-MFG 2278.54,2362.2 r0 top
U302 "SN74LVC1G17DBVR" FP-C04-091-OT-MFG 2283.46,2125.98 r0 top
U400 "ADS1256IDB" SSOP28_DB 1673.9,1909.45 r180 bottom
U401 "ADR431BRZ" SOIC8#2 1234.84,1311.02 r180 bottom
U500 "OPA380AID" SOIC8#2 516.54,866.14 r180 bottom
U501 "OPA197ID" SOIC8#2 548.82,1535.43 r180 bottom
U502 "OPA197ID" SOIC8#2 1291.34,1062.99 r180 bottom
U600 "DAC80504RTER" DAC80504_RTE 2332.48,2208.66 r180 bottom
U601 "OPA197ID" SOIC8#2 2293.11,1685.04 r180 bottom
U700 "OPA197ID" SOIC8#2 3483.46,1377.95 r180 bottom
U800 "OPA197ID" SOIC8#2 3306.3,826.77 r180 bottom
U900 "OPA197ID" SOIC8#2 3306.3,275.59 r180 bottom
U1000 "CD74HCT123M96" SOIC16 2992.13,748.03 r180 bottom
U1001 "SN74LVC1G11DBVR" SOT26#2 2874.02,472.44 r0 bottom
U1100 "OPA197ID" SOIC8#2 2677.17,1653.54 r180 bottom
U1101 "LM339BDR" SOIC14 2519.68,1141.73 r180 bottom
U1102 "LM339BDR" SOIC14 3188.98,1259.84 r180 bottom
Y400 "7.680 MHz / CL18pF" XTAL_HC49 2047.24,1496.06 r0 top

## Footprints (in the part's own frame and the unit in brackets; to place one, negate y for a bottom-side part, rotate by r counter-clockwise, add the part's x,y. Pads: shape width x height; smd on the part's side, far side on the other; paste and mask are expansions set on the pad)
5444262 [mm]
  rect 2.2x2.2 hole 1.4 mask+0.1: 1(0,0)
  round 2.2 hole 1.4 mask+0.1: 2(3.81,0)
  silkscreen extent -2.6,-7.65 6.41,1.6, body extent -2.6,-18.6 6.41,1.35, height 7.7
AP64501_SO8EP [mm]
  rect 1.505x0.802 smd paste+0 mask+0.05: 1(-2.497,1.905) 2(-2.497,0.635) 3(-2.497,-0.635) 4(-2.497,-1.905) 5(2.498,-1.905) 6(2.498,-0.635) 7(2.498,0.635) 8(2.498,1.905)
  rect 2.613x3.502 smd paste-3.502 mask+0.05: 9(0,0)
  body extent -3,-2.45 3,2.45, height 1.75
C0805#1 [mm]
  rect 1x1.45 smd paste+0 mask+0.05: 1(-0.95,0) 2(0.95,0)
  body extent -1,-0.63 1,0.63, height 1.25
C0805#2 [mm]
  rect 1x1.45 smd paste+0 mask+0.05: 1(0.95,0) 2(-0.95,0)
  body extent -1,-0.63 1,0.62, height 1.25
C1206 [mm]
  rect 1.15x1.8 smd paste+0 mask+0.05: 1(1.475,0) 2(-1.475,0)
  silkscreen extent -0.46,-0.91 0.46,0.91, body extent -1.6,-0.8 1.6,0.8, height 1.6
C1210#1 [mm]
  rect 1.15x2.7 smd paste+0 mask+0.05: 1(1.475,0) 2(-1.475,0)
  silkscreen extent -0.46,-1.36 0.46,1.36, body extent -1.6,-1.25 1.6,1.25, height 2.5
C1210#2 [mm]
  rect 1.15x2.7 smd paste+0 mask+0.05: 1(-1.475,0) 2(1.475,0)
  silkscreen extent -0.46,-1.36 0.46,1.36, body extent -1.6,-1.25 1.6,1.25, height 2.5
CM5_BERG100 [mm]
  rect 0.7x0.2 smd paste+0 mask+0.03: 1(-1.54,9.8) 2(1.54,9.8) 3(-1.54,9.4) 4(1.54,9.4) 5(-1.54,9) 6(1.54,9) 7(-1.54,8.6) 8(1.54,8.6) 9(-1.54,8.2) 10(1.54,8.2) 11(-1.54,7.8) 12(1.54,7.8) 13(-1.54,7.4) 14(1.54,7.4) 15(-1.54,7) 16(1.54,7) 17(-1.54,6.6) 18(1.54,6.6) 19(-1.54,6.2) 20(1.54,6.2) 21(-1.54,5.8) 22(1.54,5.8) 23(-1.54,5.4) 24(1.54,5.4) 25(-1.54,5) 26(1.54,5) 27(-1.54,4.6) 28(1.54,4.6) 29(-1.54,4.2) 30(1.54,4.2) 31(-1.54,3.8) 32(1.54,3.8) 33(-1.54,3.4) 34(1.54,3.4) 35(-1.54,3) 36(1.54,3) 37(-1.54,2.6) 38(1.54,2.6) 39(-1.54,2.2) 40(1.54,2.2) 41(-1.54,1.8) 42(1.54,1.8) 43(-1.54,1.4) 44(1.54,1.4) 45(-1.54,1) 46(1.54,1) 47(-1.54,0.6) 48(1.54,0.6) 49(-1.54,0.2) 50(1.54,0.2) 51(-1.54,-0.2) 52(1.54,-0.2) 53(-1.54,-0.6) 54(1.54,-0.6) 55(-1.54,-1) 56(1.54,-1) 57(-1.54,-1.4) 58(1.54,-1.4) 59(-1.54,-1.8) 60(1.54,-1.8) 61(-1.54,-2.2) 62(1.54,-2.2) 63(-1.54,-2.6) 64(1.54,-2.6) 65(-1.54,-3) 66(1.54,-3) 67(-1.54,-3.4) 68(1.54,-3.4) 69(-1.54,-3.8) 70(1.54,-3.8) 71(-1.54,-4.2) 72(1.54,-4.2) 73(-1.54,-4.6) 74(1.54,-4.6) 75(-1.54,-5) 76(1.54,-5) 77(-1.54,-5.4) 78(1.54,-5.4) 79(-1.54,-5.8) 80(1.54,-5.8) 81(-1.54,-6.2) 82(1.54,-6.2) 83(-1.54,-6.6) 84(1.54,-6.6) 85(-1.54,-7) 86(1.54,-7) 87(-1.54,-7.4) 88(1.54,-7.4) 89(-1.54,-7.8) 90(1.54,-7.8) 91(-1.54,-8.2) 92(1.54,-8.2) 93(-1.54,-8.6) 94(1.54,-8.6) 95(-1.54,-9) 96(1.54,-9) 97(-1.54,-9.4) 98(1.54,-9.4) 99(-1.54,-9.8) 100(1.54,-9.8)
  silkscreen extent -1.94,11.5 -1.24,11.5, body extent -3,-25 37,30, height 7.52
D_DO41_P10 [mm]
  rect 2.2x2.2 hole 1.1 paste-2539.97 mask+0.05: 1(0,0)
  round 2.2 hole 1.1 paste-2539.97 mask+0.05: 2(10.16,0)
  silkscreen extent 1.54,-1.47 8.62,1.47, body extent -0.4,-1.36 10.56,1.36, height 3.21
DAC80504_RTE [mm]
  rect 0.6x0.24 smd paste+0 mask+0.05: 1(1.4,-0.75) 2(1.4,-0.25) 3(1.4,0.25) 4(1.4,0.75) 9(-1.4,0.75) 10(-1.4,0.25) 11(-1.4,-0.25) 12(-1.4,-0.75)
  rect 0.24x0.6 smd paste+0 mask+0.05: 5(0.75,1.4) 6(0.25,1.4) 7(-0.25,1.4) 8(-0.75,1.4) 13(-0.75,-1.4) 14(-0.25,-1.4) 15(0.25,-1.4) 16(0.75,-1.4)
  rect 0.8x0.8 smd paste-0.8 mask+0.05: 17(0,0)
  silkscreen extent 1.31,-1.7 1.75,-1.7, body extent -1.55,-1.55 1.55,1.55, height 0.75
DO-214AA [mm]
  rect 2.3x3.5 smd paste+0 mask+0.05: 1(-2.5,0) 2(2.5,0)
  silkscreen extent -0.9,-2 0.84,2, body extent -2.79,-1.97 2.79,1.98, height 2.65
DO-214AC [mm]
  rect 2.3x3 smd paste+0 mask+0.05: 1(-2.5,0) 2(2.5,0)
  silkscreen extent -0.9,-1.3 0.84,1.3, body extent -2.6,-1.3 2.6,1.3, height 2.4
FP-C04-091-OT-MFG [mm]
  rect 1.1x0.6 smd paste+0 mask+0.04: 1(-1.4,0.95) 2(-1.4,0) 3(-1.4,-0.95) 4(1.4,-0.95) 5(1.4,0.95)
  silkscreen extent -2.7,-1.55 0.37,1.55, body extent -1.6,-1.55 1.6,1.55, height 1.45
FUSE_NANO2 [mm]
  rect 1.96x3.15 smd paste+0 mask+0.05: 1(-2.455,0) 2(2.455,0)
  body extent -3.05,-1.38 3.05,1.38, height 2.78
G6K_2F_Y [mm]
  rect 1.8x0.8 smd paste+0 mask+0.05: 1(-3.5,3.8) 2(-3.5,0.6) 3(-3.5,-1.6) 4(-3.5,-3.8) 5(3.5,-3.8) 6(3.5,-1.6) 7(3.5,0.6) 8(3.5,3.8)
  silkscreen extent -3.34,-5.1 3.36,5.1, body extent -3.9,-5 3.9,5, height 5.58
HDR_1X02_P254 [mm]
  rect 1.7x1.7 hole 1 paste-2539.97 mask+0.05: 1(0,0)
  round 1.7 hole 1 paste-2539.97 mask+0.05: 2(0,-2.54)
  silkscreen extent -1.33,-3.87 1.33,1.33, body extent -1.27,-3.81 1.27,1.27, height 8.54
HDR_1X04_P254 [mm]
  rect 1.7x1.7 hole 1 paste-2539.97 mask+0.05: 1(0,0)
  round 1.7 hole 1 paste-2539.97 mask+0.05: 2(0,-2.54) 3(0,-5.08) 4(0,-7.62)
  silkscreen extent -1.33,-8.95 1.33,1.33, body extent -1.27,-8.89 1.27,1.27, height 8.54
HIROSE_UFL [mm]
  rect 1.05x1 smd paste+0 mask+0.05: 1(-1.05,0)
  rect 2.2x1.05 smd paste+0 mask+0.05: 2(0.475,1.475) 2(0.475,-1.475)
  silkscreen extent 1.84,-0.51 1.84,0.51, body extent -1.55,-1.5 1.55,1.5, height 1.25
NPTH_CM5_M2.5_2.7mm [mm]
  round 2.7 hole 2.7 unplated paste-2539.97 mask+0: ""(0,0)
NPTH_M3_3.2mm [mm]
  round 3.2 hole 3.2 unplated paste-2539.97 mask+0: ""(0,0)
ONSC-SOT-23-3-318-08_V#1 [mm]
  rect 0.9x0.8 smd paste+0 mask+0.05: 1(-1,0.95) 2(-1,-0.95) 3(1,0)
  silkscreen extent -1.12,-1.44 0.65,1.89, body extent -1.28,-1.5 1.28,1.5, height 1.15
ONSC-SOT-23-3-318-08_V#2 [mm]
  rect 0.9x0.8 smd paste+0 mask+0.05: 1(1,-0.95) 2(1,0.95) 3(-1,0)
  silkscreen extent -0.65,-1.46 0.07,1.46, body extent -1.28,-1.5 1.28,1.5, height 1.15
PICO_TH40 [mm]
  rect 1.8x1.8 hole 1 paste-2539.97 mask+0.05: 1(-8.89,24.13)
  round 1.8 hole 1 paste-2539.97 mask+0.05: 2(-8.89,21.59) 3(-8.89,19.05) 4(-8.89,16.51) 5(-8.89,13.97) 6(-8.89,11.43) 7(-8.89,8.89) 8(-8.89,6.35) 9(-8.89,3.81) 10(-8.89,1.27) 11(-8.89,-1.27) 12(-8.89,-3.81) 13(-8.89,-6.35) 14(-8.89,-8.89) 15(-8.89,-11.43) 16(-8.89,-13.97) 17(-8.89,-16.51) 18(-8.89,-19.05) 19(-8.89,-21.59) 20(-8.89,-24.13) 21(8.89,-24.13) 22(8.89,-21.59) 23(8.89,-19.05) 24(8.89,-16.51) 25(8.89,-13.97) 26(8.89,-11.43) 27(8.89,-8.89) 28(8.89,-6.35) 29(8.89,-3.81) 30(8.89,-1.27) 31(8.89,1.27) 32(8.89,3.81) 33(8.89,6.35) 34(8.89,8.89) 35(8.89,11.43) 36(8.89,13.97) 37(8.89,16.51) 38(8.89,19.05) 39(8.89,21.59) 40(8.89,24.13)
  silkscreen extent -10.75,25.7 -10.05,25.7, body extent -10.5,-25.5 10.5,26.8, height 10.1
R1206 [mm]
  rect 1.125x1.75 smd paste+0 mask+0.05: 1(1.462,0) 2(-1.463,0)
  silkscreen extent -0.46,-0.91 0.46,0.91, body extent -1.6,-0.8 1.6,0.8, height 0.55
R-0603#1 [mm]
  rect 0.75x0.9 smd paste+0 mask+0.05: 1(-0.765,0) 2(0.765,0)
  body extent -0.8,-0.4 0.8,0.4, height 0.47
R-0603#2 [mm]
  rect 0.75x0.9 smd paste+0 mask+0.05: 1(0.765,0) 2(-0.765,0)
  body extent -0.8,-0.4 0.8,0.4, height 0.47
SMA_132134 [mm]
  round 2.05 hole 1.5 paste-2539.97 mask+0.05: 1(0,0)
  round 2.25 hole 1.7 paste-2539.97 mask+0.05: 2(-2.54,-2.54) 2(-2.54,2.54) 2(2.54,-2.54) 2(2.54,2.54)
  silkscreen extent -3.68,-3.68 3.68,3.68, body extent -3.5,-3.5 3.5,3.5, height 8.1
SOD-123#1 [mm]
  rect 1.2x1.22 smd paste+0 mask+0.05: 1(-1.905,0) 2(1.905,0)
  silkscreen extent -0.84,-0.89 0.84,0.89, body extent -1.93,-0.9 1.93,0.9, height 1.35
SOD-123#2 [mm]
  rect 1.2x1.22 smd paste+0 mask+0.05: 1(1.905,0) 2(-1.905,0)
  silkscreen extent -0.84,-0.89 0.84,0.89, body extent -1.93,-0.9 1.93,0.9, height 1.35
SOIC8#1 [mm]
  rect 1.95x0.6 smd paste+0 mask+0.05: 1(-2.475,1.905) 2(-2.475,0.635) 3(-2.475,-0.635) 4(-2.475,-1.905) 5(2.475,-1.905) 6(2.475,-0.635) 7(2.475,0.635) 8(2.475,1.905)
  silkscreen extent -1.05,-2.56 1.06,2.56, body extent -3,-2.45 3,2.45, height 1.75
SOIC8#2 [mm]
  rect 1.95x0.6 smd paste+0 mask+0.05: 1(2.475,-1.905) 2(2.475,-0.635) 3(2.475,0.635) 4(2.475,1.905) 5(-2.475,1.905) 6(-2.475,0.635) 7(-2.475,-0.635) 8(-2.475,-1.905)
  silkscreen extent -1.05,-2.56 1.06,2.56, body extent -3,-2.45 3,2.45, height 1.75
SOIC14 [mm]
  rect 1.95x0.6 smd paste+0 mask+0.05: 1(2.475,-3.81) 2(2.475,-2.54) 3(2.475,-1.27) 4(2.475,0) 5(2.475,1.27) 6(2.475,2.54) 7(2.475,3.81) 8(-2.475,3.81) 9(-2.475,2.54) 10(-2.475,1.27) 11(-2.475,0) 12(-2.475,-1.27) 13(-2.475,-2.54) 14(-2.475,-3.81)
  silkscreen extent -1.06,4.44 0.42,4.44, body extent -3,-4.35 3,4.35, height 1.75
SOIC16 [mm]
  rect 1.95x0.6 smd paste+0 mask+0.05: 1(2.475,-4.445) 2(2.475,-3.175) 3(2.475,-1.905) 4(2.475,-0.635) 5(2.475,0.635) 6(2.475,1.905) 7(2.475,3.175) 8(2.475,4.445) 9(-2.475,4.445) 10(-2.475,3.175) 11(-2.475,1.905) 12(-2.475,0.635) 13(-2.475,-0.635) 14(-2.475,-1.905) 15(-2.475,-3.175) 16(-2.475,-4.445)
  silkscreen extent -1.06,-5.06 1.05,5.06, body extent -3,-4.95 3,4.95, height 1.75
SOT26#1 [mm]
  rect 1.1x0.6 smd paste+0 mask+0.04: 1(1.3,-0.95) 2(1.3,0) 3(1.3,0.95) 4(-1.3,0.95) 5(-1.3,0) 6(-1.3,-0.95)
  silkscreen extent -0.27,-1.77 0.91,1.38, body extent -1.5,-1.55 1.5,1.55, height 1.4
SOT26#2 [mm]
  rect 1.1x0.6 smd paste+0 mask+0.04: 1(-1.3,0.95) 2(-1.3,0) 3(-1.3,-0.95) 4(1.3,-0.95) 5(1.3,0) 6(1.3,0.95)
  silkscreen extent -0.91,-1.37 0.27,1.77, body extent -1.5,-1.55 1.5,1.55, height 1.4
SSOP28_DB [mm]
  rect 1.75x0.45 smd paste+0 mask+0.045: 1(3.6,-4.225) 2(3.6,-3.575) 3(3.6,-2.925) 4(3.6,-2.275) 5(3.6,-1.625) 6(3.6,-0.975) 7(3.6,-0.325) 8(3.6,0.325) 9(3.6,0.975) 10(3.6,1.625) 11(3.6,2.275) 12(3.6,2.925) 13(3.6,3.575) 14(3.6,4.225) 15(-3.6,4.225) 16(-3.6,3.575) 17(-3.6,2.925) 18(-3.6,2.275) 19(-3.6,1.625) 20(-3.6,0.975) 21(-3.6,0.325) 22(-3.6,-0.325) 23(-3.6,-0.975) 24(-3.6,-1.625) 25(-3.6,-2.275) 26(-3.6,-2.925) 27(-3.6,-3.575) 28(-3.6,-4.225)
  silkscreen extent -2.87,-5.33 2.88,5.32, body extent -3.9,-5.1 3.9,5.1, height 2.1
SW_TL3305A [mm]
  rect 1.6x1.4 smd paste+0 mask+0.05: 1(-3.6,1.5) 1(3.6,1.5) 2(-3.6,-1.5) 2(3.6,-1.5)
  silkscreen extent -2.37,-2.37 2.37,2.37, body extent -4.05,-2.15 4.05,2.15, height 2.4
TANT_D [mm]
  rect 2.075x2.55 smd paste+0 mask+0.05: 1(-3.113,0) 2(3.113,0)
  silkscreen extent -4.41,-2.26 0.7,2.26, body extent -3.65,-2.15 3.65,2.15, height 3.1
TMR3_SIP8_15V [mm]
  rect 1.8x1.8 hole 1 mask+0.1: 1(0,0)
  round 1.8 hole 1 mask+0.1: 2(2.54,0) 3(5.08,0) 5(10.16,0) 6(12.7,0) 7(15.24,0) 8(17.78,0)
  silkscreen extent -2,-5.6 19.8,3.5, body extent -2,-5.6 19.8,3.5, height 11.2
TO220_3 [mm]
  rect 1.905x2 hole 1.1 paste-2539.97 mask+0.05: 1(0,0)
  oval 1.905x2 hole 1.1 paste-2539.97 mask+0.05: 2(2.54,0) 3(5.08,0)
  silkscreen extent -2.58,-1.37 7.66,3.27, body extent -2.59,-1.3 7.67,3.16, height 18.77
TP06R [mm]
  round 0.6 smd paste-1 mask+0.05: 1(0,0)
USB_C_12401610 [mm]
  rect 0.3x0.7 smd paste+0 mask+0.04: A1(-2.75,5.02) A2(-2.25,5.02) A3(-1.75,5.02) A4(-1.25,5.02) A5(-0.75,5.02) A6(-0.25,5.02) A7(0.25,5.02) A8(0.75,5.02) A9(1.25,5.02) A10(1.75,5.02) A11(2.25,5.02) A12(2.75,5.02) B1(2.5,3.32) B2(2,3.32) B3(1.5,3.32) B4(1,3.32) B5(0.5,3.32) B6(0,3.32) B7(-0.5,3.32) B8(-1,3.32) B9(-1.5,3.32) B10(-2,3.32) B11(-2.5,3.32) B12(-3,3.32)
  round 1.4 hole 1.1 paste-2539.97 mask+0.04: SH(-4.49,-2.84) SH(-4.13,3.11) SH(4.13,3.11) SH(4.49,-2.84)
  round 0.65 hole 0.65 unplated paste-2539.97 mask+0.04: ""(-3.6,4.36)
  round 0.95 hole 0.95 unplated paste-2539.97 mask+0.04: ""(3.6,4.36)
  silkscreen extent -4.75,-1.7 4.75,5.37, body extent -4.6,-5.2 4.6,5.2, height 3.3
XAL7070 [mm]
  rect 1.92x6.5 smd paste+0 mask+0.05: 1(-2.41,0) 2(2.41,0)
  silkscreen extent -3.75,3.95 -3.15,3.95, body extent -3.6,-3.75 3.6,3.75, height 4.6
XTAL_HC49 [mm]
  round 1.5 hole 0.8 paste-2539.97 mask+0.05: 1(0,0) 2(4.88,0)
  silkscreen extent -0.76,-2.52 5.64,2.53, body extent -3.09,-2.32 7.97,2.32, height 4.1

## Via types
v1: diameter 23.62, hole 11.81, Top Layer to Bottom Layer, tented both sides, 3043 vias
v2: diameter 39.37, hole 19.68, Top Layer to Bottom Layer, tented both sides, 22 vias
v3: diameter 19.68, hole 11.81, Top Layer to Bottom Layer, tented both sides, 14 vias
v4: diameter 21.65, hole 11.81, Top Layer to Bottom Layer, tented both sides, 4 vias

## Nets (pads, with @x,y where several pads share a name; then routed paths per layer and width w, separated by ;. In a path a pad name is that pad's centre, name@x,y a point inside that pad or via, vN(x,y) a via of type N, cw(c..) or ccw(c..) an arc to the next point about the centre after c; other vN are vias at no path point)
+5V_SYS: C110.1 C111.1 C112.1 C113.1 C205.1 C206.1 C207.1 C1002.1 C1003.1 C1004.1 D300.2 J100.77 J100.79 J100.81 J100.83 J100.85 J100.87 J104.2 L200.2 R202.1 R1000.1 R1001.1 SW1000.1 U1000.16 U1101.3 U1102.3 | length 15791.6
  Top Layer w7.87: 330.71,1874.02 J100.87@372.44,1874.02 ; 330.71,1889.76 J100.85@372.44,1889.76 ; 330.71,1905.51 J100.83@372.44,1905.51 ; 330.71,1921.26 J100.81@372.44,1921.26 ; 330.71,1937.01 J100.79@372.44,1937.01 ; 330.71,1952.76 J100.77@372.44,1952.76 ; 3923.23,2674.61 3927.17,2670.67 4025.59,2670.67 4025.59,2666.73 4029.53,2666.73 v1(4037.4,2658.86) ; v1(4057.09,3056.5) 4100.39,3099.8 4101.38,3100.39
  Top Layer w15.75: v1(2477.36,1162.6) 2504.92,1190.16 2504.92,1213.78 2512.8,1221.65 2512.8,1276.77 2516.73,1280.71 2516.73,1284.65 2520.67,1288.58 2520.67,1375.2 v1(2524.61,1379.13) ; 4101.38,3100.39 4101.38,3098.43 4113.19,3110.24 4113.19,3114.17 4117.13,3118.11 4117.13,3122.05 v1(4144.68,3149.61)
  Top Layer w31.5: v2(295.28,1937.01) 330.71,1937.01 330.71,1921.26 ; 330.71,1874.02 330.71,1952.76 ; J100.85@372.44,1889.76 J100.83@372.44,1905.51 ; C113.1@592.52,1692.91 592.52,1779.53 ; C112.1@592.52,1850.39 592.52,1779.53 ; v2(842.52,1779.53) 592.52,1779.53 ; v1(2524.61,1379.13) 2546.06,1357.68 R1000.1@2656.3,1357.68 ; D300.2@3311.12,2559.05 3311.12,3008.99 3530.48,3228.35 3532.48,3228.35 ; C207.1@3410.43,3464.57 3410.43,3350.39 3532.48,3228.35 ; C206.1@3589.57,3464.57 3589.57,3350.39 3711.61,3228.35 ; v2(3771.26,3228.35) 3711.61,3228.35 ; v2(3865.75,3228.35) 3873.03,3235.63 3873.03,3380.61 4052.65,3380.61 4101.38,3331.88 4101.38,3100.39 ; 3532.48,3228.35 3711.61,3228.35
  Top Layer w39.37: v2(295.28,1889.76) v2(295.28,1984.25) ; v2(875.93,1812.93) v2(842.52,1779.53) v2(889.76,1779.53) ; v2(3771.26,3228.35) v2(3865.75,3228.35) ; v2(3891.67,1379.86) v2(3858.27,1346.46) v2(3905.51,1346.46)
  Top Layer w118.11: v2(842.52,1779.53) 1590.55,1779.53 1653.54,1716.54 1661.42,1716.54 1669.29,1708.66 1692.91,1708.66 1992.13,1409.45 2000,1409.45 2007.87,1401.57 2031.5,1401.57 2039.37,1393.7 2448.82,1393.7 2456.69,1385.83 2826.77,1385.83 2984.25,1228.35 3000,1228.35 3007.87,1220.47 3212.6,1220.47 3220.47,1228.35 3236.22,1228.35 3330.71,1322.83 3629.92,1322.83 3637.8,1330.71 3645.67,1330.71 3653.54,1338.58 3850.39,1338.58 v2(3858.27,1346.46)
  GND L3 w7.87: v1(4037.4,2658.86) 4037.4,2788.78 4041.34,2792.72 4041.34,3025 4049.21,3032.87 4049.21,3040.75 4057.09,3048.62 v1(4057.09,3056.5)
  GND L3 w31.5: v2(2823.98,167.9) 3024.28,368.2 v2(3024.28,573.03)
  Bottom Layer w5.91: v1(2985.24,1201.97) U1102.3@3091.54,1209.84
  Bottom Layer w7.87: R202.1@3934.25,2457.28 4038.78,2457.28 4078.74,2417.32
  Bottom Layer w15.75: J104.2@137.8,2970.87 137.8,2971.46 161.42,2947.83 161.42,2943.9 181.1,2924.21 181.1,2920.28 200.79,2900.59 200.79,2896.65 220.47,2876.97 220.47,2873.03 240.16,2853.35 240.16,2849.41 259.84,2829.72 259.84,2825.79 279.53,2806.1 279.53,2802.17 303.15,2778.54 303.15,2774.61 311.02,2766.73 311.02,2184.06 314.96,2184.06 314.96,2180.12 318.9,2180.12 318.9,2176.18 322.83,2176.18 326.77,2172.24 472.44,2172.24 511.81,2132.87 515.75,2132.87 519.68,2128.94 539.37,2128.94 543.31,2132.87 547.24,2132.87 594.49,2180.12 618.11,2180.12 622.05,2184.06 C111.1@629.92,2184.05 ; U1101.3@2422.24,1091.73 2445.87,1115.35 2469.49,1115.35 2477.36,1123.23 v1(2477.36,1162.6) ; v1(2524.61,1379.13) 2524.61,1394.88 2556.1,1426.38 2556.1,1446.06 2560.04,1450 2560.04,1457.87 C1002.1@2559.05,1456.69 ; v1(4144.68,3149.61) 4168.31,3125.98 4187.99,3125.98 4191.93,3122.05 4195.87,3122.05 4195.87,3118.11 4203.74,3110.24 4203.74,3086.61 4302.16,2988.19 4302.16,2980.31 4565.94,2716.54 SW1000.1@4566.93,2716.54
  Bottom Layer w31.5: C110.1@629.92,1987.2 704.79,1987.2 ; C111.1@629.92,2184.05 704.79,2109.18 704.79,1987.2 ; v2(875.93,1812.93) 875.93,1816.07 704.79,1987.2 ; U1101.3@2422.24,1091.73 2362.14,1091.73 2362.14,843.22 2211.81,692.89 R1001.1@2211.81,656.4 2251.25,656.41 2294.45,656.41 2368.11,582.74 C1003.1@2368.11,532.48 2368.11,482.22 2407.61,482.22 2728.35,161.48 ; C1004.1@2728.35,120.08 2728.35,161.48 ; v2(2823.98,167.9) 2734.76,167.9 2728.35,161.48 ; v2(3024.28,573.03) U1000.16@3089.57,573.03 ; C205.1@3979.33,3281.5 4058.07,3202.76 4089.57,3202.76 4091.53,3202.76 v1(4144.68,3149.61)
  Bottom Layer w39.37: v2(875.93,1812.93) v2(842.52,1779.53) v2(889.76,1779.53) ; v2(3891.67,1379.86) v2(3858.27,1346.46) v2(3905.51,1346.46)
  Bottom Layer w118.11: v2(295.28,1937.01) 377.95,1937.01 425.2,1889.76 433.07,1889.76 535.43,1787.4 543.31,1787.4 551.18,1779.53 v2(842.52,1779.53) ; v2(3818.5,3228.35) 3818.9,3228.35 4078.74,2968.5 4078.74,2417.32 4086.61,2409.45 4086.61,2401.57 4094.49,2393.7 4094.49,2385.83 4149.61,2330.71 4149.61,2236.22 3858.27,1944.88 v2(3858.27,1346.46)
+11VA: C211.1 C214.1 C701.1 C801.1 C901.1 D210.2 R210.1 R1006.1 U210.2 U212.5 U212.8 U700.7 U800.7 U900.7 | length 4871.9
  Top Layer w15.75: v1(3352.56,777.56) 3407.68,722.44 3407.68,553.15 3411.61,549.21 3411.61,525.59 3427.36,509.84 v1(3427.36,505.91) ; C801.1@3488.39,982.28 v1(3488.39,1021.49) ; v1(3536.18,1647.85) 3577.5,1689.17 U212.8@3640.75,1689.17 3692.98,1689.17 3692.98,1716.47 ; U212.5@3640.75,1539.17 3692.98,1539.17 3726.68,1572.87 3726.68,1693.57 3705.81,1714.44 3705.81,1730.3 3702.56,1733.55 3692.98,1723.97 3692.98,1716.47 ; C211.1@4183.07,1634.84 4092.69,1634.84 3983.54,1743.99 3983.54,1789.44 ; 3692.98,1716.47 3690.94,1716.47 C214.1@3690.94,1752.95 3690.94,1789.44 3983.54,1789.44 ; 3983.54,1789.44 4143.11,1949.01 4143.11,1998.03 ; 4143.11,1998.03 4143.11,2029.59 4126.6,2029.59 v1(4120.37,2035.82) 4143.11,1998.03
  GND L3 w15.75: v1(3351.51,825.09) 3351.51,884.61 v1(3488.39,1021.49) 3388.99,1120.89 3388.99,1535.18 v1(3370.58,1553.59) ; v1(4120.37,2035.82) 4126.73,2029.46 4269.29,2029.46 4470.08,2230.25 U210.2@4470.08,2283.46 4592.91,2406.3 D210.2@4592.91,2480.31
  Bottom Layer w15.75: R1006.1@3349.61,1765.55 3349.61,1764.83 3488.39,1626.05 ; v1(3351.51,825.09) 3351.51,801.77 U800.7@3403.74,801.77 3403.74,801.18 3380.12,777.56 v1(3352.56,777.56) ; v1(3370.58,1553.59) 3375.98,1558.99 3488.39,1558.99 ; U900.7@3403.74,250.59 3351.51,250.59 3351.51,371.15 3411.46,431.1 C901.1@3488.39,431.1 3486.42,431.1 3431.3,486.22 3431.3,501.97 v1(3427.36,505.91) ; v1(3536.18,1647.85) 3514.38,1626.05 3488.39,1626.05 ; U700.7@3580.91,1352.95 3528.67,1352.95 3528.67,1475.22 3530.86,1477.41 3530.86,1545.85 3517.72,1558.99 3488.39,1558.99 ; v1(4120.37,2035.82) 4120.37,2020.77 R210.1@4143.11,1998.03 ; 3488.39,1558.99 C701.1@3488.39,1592.52 3488.39,1626.05 ; 3488.39,982.28 v1(3488.39,1021.49) 3488.39,982.28
-11VA: C213.2 C702.1 C802.1 C902.1 D211.1 R212.1 R1008.1 U211.3 U700.4 U800.4 U900.4 | length 5515
  Top Layer w9.84: v1(3606.5,1484.45) 3614.37,1484.45 3630.12,1500.2 3716.73,1500.2 3756.1,1539.57 4094.68,1539.57 4122.24,1567.13 4157.68,1567.13 4189.17,1598.62 4216.73,1598.62 4224.61,1590.75 4224.61,1586.81 4228.54,1582.87 4228.54,1563.19 4232.48,1559.25 4232.48,1555.31 4252.17,1535.63 v3(4251.38,1535.43)
  Top Layer w15.75: v1(3263.98,956.89) 3358.46,1051.38 v1(3397.83,1051.38) ; v1(3283.66,879.92) 3291.54,872.05 3291.54,868.11 3295.47,864.17 3295.47,828.74 3283.66,816.93 3283.66,812.99 3279.72,809.05 3279.72,781.5 v1(3291.54,769.68) ; 3346.65,1415.35 3346.65,1413.58 3354.53,1421.46 3386.02,1421.46 3389.96,1425.39 3393.9,1425.39 3401.77,1433.27 v1(3441.14,1433.27) ; v1@3439.17,1435.04 3427.36,1423.23 3419.49,1423.23 3411.61,1415.35 3281.69,1415.35 3250.2,1446.85 3246.26,1446.85 3242.32,1450.79 3214.76,1450.79 ; v1(3606.5,1484.45) v1(3740.35,1484.45) ; D211.1@4192.91,2086.61 4173.23,2066.93 4173.23,1973.67 4202.94,1943.96 4207.19,1943.96 ; v3(4251.38,1535.43) 4251.38,1782.74 4218.24,1815.88 4207.19,1815.88 C213.2@4207.19,1879.92 4207.19,1943.96 ; U211.3@4570.08,1889.76 4515.88,1943.96 4207.19,1943.96 ; v1@3057.28,1438.98 3199.02,1438.98 ; v1@3057.28,1438.98 v1(3053.35,1442.91) v1@3057.28,1438.98 ; v1@3057.28,1438.98 3199.02,1438.98 ; 3199.02,1438.98 3202.95,1442.91 ; 3199.02,1438.98 3202.95,1442.91 ; 3202.95,1442.91 3206.89,1442.91 ; 3202.95,1442.91 3206.89,1442.91 ; 3206.89,1442.91 3210.83,1446.85 ; 3206.89,1442.91 3210.83,1446.85 ; 3210.83,1446.85 3214.76,1446.85 ; 3210.83,1446.85 3214.76,1446.85 ; 3214.76,1446.85 3214.76,1450.79 ; 3214.76,1446.85 3214.76,1450.79
  GND L3 w9.84: v1(3441.14,1433.27) 3449.02,1441.14 3456.89,1441.14 3468.7,1452.95 3500.2,1452.95 3504.13,1456.89 3539.57,1456.89 3543.5,1460.83 3582.87,1460.83 v1(3606.5,1484.45)
  GND L3 w15.75: v1(3154.58,880.52) 3199.08,836.02 3199.08,402.24 v1(3177.35,380.51) ; v1(3441.14,1433.27) 3456.89,1449.02 3492.32,1449.02 3496.26,1452.95 3504.13,1452.95 3535.63,1484.45 v1(3606.5,1484.45) ; v1(3559.25,1181.3) 3567.13,1189.17 3575,1189.17 3578.94,1193.11 3578.94,1197.05 3582.87,1200.98 3582.87,1291.54 3677.36,1386.02 3677.36,1389.96 3681.3,1393.9 3681.3,1397.83 3685.24,1401.77 3685.24,1452.95 3716.73,1484.45 v1(3740.35,1484.45)
  Bottom Layer w9.84: U700.4@3386.02,1452.95 3421.46,1452.95 v1(3441.14,1433.27)
  Bottom Layer w15.75: C902.1@3124.21,312.99 3124.21,346.52 3152.56,346.52 3156.63,350.59 U900.4@3177.35,350.59 ; v1(3154.58,880.52) 3156.63,882.56 3156.63,901.77 U800.4@3208.86,901.77 ; C802.1@3173.43,687.01 3208.86,722.44 3252.17,722.44 3256.1,726.38 3260.04,726.38 3260.04,730.31 3263.98,734.25 3263.98,742.13 v1(3291.54,769.68) ; v1(3177.35,380.51) U900.4@3177.35,350.59 ; U900.4@3208.86,350.59 3196.56,350.59 U900.4@3177.35,350.59 ; v1(3263.98,956.89) U800.4@3208.86,901.77 ; v1(3283.66,879.92) 3279.72,879.92 3275.79,883.86 3271.85,883.86 3252.17,903.54 3208.86,903.54 U800.4@3208.86,901.77 ; 3391.8,1211.22 R1008.1@3360.24,1211.22 R1008.1@3358.46,1212.8 ; v1(3397.83,1051.38) 3405.71,1059.25 3405.71,1063.19 3409.65,1067.13 3409.65,1161.61 R1008.1@3358.46,1212.8 ; 3438.26,1452.95 U700.4@3386.02,1452.95 3384.06,1454.72 3419.49,1454.72 v1@3439.17,1435.04 ; v1(3559.25,1181.3) 3551.38,1173.43 3547.44,1173.43 3543.5,1169.49 3519.88,1169.49 3515.94,1173.43 3512.01,1173.43 3504.13,1181.3 3449.02,1181.3 3441.14,1189.17 3425.39,1189.17 3401.77,1212.8 R1008.1@3358.46,1212.8 ; R212.1@4251.38,1456.69 v3(4251.38,1535.43) ; 3025.79,1435.04 v1@3045.47,1435.04 ; 3025.79,1435.04 C702.1@3006.1,1415.35 3025.79,1435.04 ; 3025.79,1435.04 v1@3045.47,1435.04 ; v1@3045.47,1435.04 v1(3053.35,1442.91) v1@3045.47,1435.04
ADC_CS_N: R401.2 U300.22 U400.20 | length 2713.5
  Top Layer w7.87: v1(1559.72,2136.81) 1559.72,2172.24 1599.09,2211.61 1599.09,2231.3 v1(1646.34,2278.54) ; v1(2004.61,2085.63) v1(2004.61,2231.3) ; v1(2131.97,1913.78) 2439.06,1913.78 2458.74,1933.46 2462.68,1933.46 2466.61,1937.4 2620.16,1937.4 2631.97,1925.59 2635.91,1925.59 2655.59,1905.91 2659.53,1905.91 2671.34,1894.09 2683.15,1894.09 2691.02,1886.22 2694.96,1886.22 2714.65,1866.54 v1(2718.58,1866.54) ; v1(2769.76,1819.29) 2836.69,1819.29 2848.5,1807.48 2852.44,1807.48 2864.25,1795.67 2868.19,1795.67 2887.87,1775.98 2891.81,1775.98 2911.5,1756.3 2915.43,1756.3 2935.12,1736.61 2939.06,1736.61 2958.74,1716.93 2962.68,1716.93 2982.36,1697.24 2986.3,1697.24 3002.05,1681.5 3005.98,1681.5 3025.67,1661.81 3029.61,1661.81 3049.29,1642.13 3053.23,1642.13 3072.91,1622.44 3076.85,1622.44 3096.54,1602.76 3108.35,1602.76 3112.28,1598.82 3175.28,1598.82 3183.15,1590.94 U300.22@3184.65,1590.94
  GND L3 w7.87: v1(1559.72,2136.81) 1583.35,2113.19 1689.65,2113.19 1721.14,2081.69 1721.14,2073.82 1725.08,2069.88 1725.08,2062.01 1729.02,2062.01 1729.02,2058.07 1732.95,2058.07 1736.89,2054.13 1760.51,2054.13 1855,1959.65 1855,1951.77 v1(1866.81,1939.96) ; v1(1646.34,2278.54) 1658.15,2290.35 1662.09,2290.35 1666.02,2294.29 1689.65,2294.29 1693.58,2290.35 1882.56,2290.35 1941.61,2231.3 v1(2004.61,2231.3) ; v1(2718.58,1866.54) 2738.27,1846.85 2742.2,1846.85 v1(2769.76,1819.29)
  Bottom Layer w5.91: U400.20@1815.63,1947.83 v1(1866.81,1939.96)
  Bottom Layer w7.87: v1(2004.61,2085.63) 2004.61,2054.13 2028.23,2030.51 2028.23,2006.89 2024.29,2002.95 2024.29,1999.02 2020.35,1999.02 2016.42,1995.08 1988.86,1995.08 1977.05,1983.27 R401.2@1978.43,1984.25 1978.43,1984.65 2021.73,1984.65 2053.23,1953.15 2057.17,1953.15 2061.1,1949.21 2065.04,1949.21 2068.98,1945.28 2072.91,1945.28 2088.66,1929.53 2092.6,1929.53 2096.54,1925.59 2100.47,1925.59 2108.35,1917.72 2112.28,1917.72 2116.22,1913.78 v1(2131.97,1913.78)
ADC_DRDY_N: U300.29 U400.21 | length 1858.6
  Top Layer w7.87: v1(2024.29,1910.43) 2028.23,1906.5 2103.03,1906.5 2118.78,1890.75 2122.72,1890.75 2154.21,1859.25 2197.52,1859.25 2205.39,1867.13 2276.26,1867.13 v1(2299.88,1890.75) ; v1(2524.29,2154.53) 2811.69,2154.53 2823.5,2166.34 2827.44,2166.34 2847.13,2186.02 2851.06,2186.02 2870.75,2205.71 2874.68,2205.71 2894.37,2225.39 2898.31,2225.39 2917.99,2245.08 2921.93,2245.08 2941.61,2264.76 2945.55,2264.76 2961.3,2280.51 2965.24,2280.51 2977.05,2292.32 2980.98,2292.32 3036.1,2347.44 3126.65,2347.44 3138.46,2335.63 3142.4,2335.63 3185.71,2292.32 U300.29@3184.65,2290.94
  GND L3 w7.87: v1(1941.61,1906.5) 1957.36,1906.5 1977.05,1886.81 1984.92,1886.81 1988.86,1882.87 2004.61,1882.87 2028.23,1906.5 v1(2024.29,1910.43) ; v1(2299.88,1890.75) 2402.24,1993.11 2402.24,2020.67 2414.06,2032.48 2461.3,2032.48 2465.24,2036.42 2500.67,2036.42 2532.17,2067.91 2532.17,2146.65 v1(2524.29,2154.53)
  Bottom Layer w5.91: U400.21@1815.63,1922.24 v1(1941.61,1906.5)
  Bottom Layer w7.87: U400.21@1815.63,1922.24 1851.06,1922.24 1858.94,1914.37 1882.56,1914.37 1886.5,1910.43 1937.68,1910.43 v1(1941.61,1906.5)
ADC_RESET_N: R402.2 U300.4 U400.15 | length 1813.9
  Top Layer w7.87: v1(1914.06,2123.03) 1914.06,2130.91 1917.99,2134.84 1917.99,2166.34 1925.87,2174.21 1925.87,2178.15 1980.98,2233.27 1980.98,2264.76 1988.86,2272.64 1988.86,2276.57 2036.1,2323.82 2036.1,2331.69 v1(2095.16,2390.75) ; v1(2162.09,2563.98) 2169.96,2571.85 2169.96,2575.79 2189.65,2595.47 2189.65,2599.41 2252.64,2662.4 2252.64,2804.13 2256.57,2808.07 2256.57,2812.01 2268.39,2823.82 2268.39,2827.76 2280.2,2839.57 2280.2,2843.5 2299.88,2863.19 2299.88,2867.13 2319.57,2886.81 2319.57,2890.75 2339.25,2910.43 2343.19,2910.43 2351.06,2918.31 2390.43,2918.31 2390.43,2985.24 2394.37,2989.17 2394.37,2993.11 2414.06,3012.8 2414.06,3016.73 2433.74,3036.42 2433.74,3040.35 2484.92,3091.54 U300.4@2484.65,3090.94
  GND L3 w5.91: v1(1977.05,1935.04) v1(1977.05,2029.53)
  Bottom Layer w5.91: v1(1902.24,2103.35) 1843.19,2103.35 U400.15@1815.63,2075.79 1815.63,2076.77 1827.44,2088.58 1847.13,2088.58 1858.94,2100.39 1882.56,2100.39 1886.5,2096.46 1890.43,2096.46 1949.49,2037.4 1961.3,2037.4 1969.17,2029.53 v1(1977.05,2029.53) ; v1(1977.05,1935.04) 1977.05,1927.17 1973.11,1923.23 1973.11,1915.35 1969.17,1911.42 1969.17,1879.92 1977.05,1872.05 R402.2@1978.43,1872.05
  Bottom Layer w7.87: U400.15@1815.63,2075.79 1831.38,2091.54 1843.19,2091.54 1855,2103.35 1882.56,2103.35 1902.24,2123.03 v1(1914.06,2123.03) ; v1(2095.16,2390.75) 2106.97,2402.56 2106.97,2406.5 2110.91,2410.43 2110.91,2504.92 2130.59,2524.61 2130.59,2528.54 2150.28,2548.23 2150.28,2552.17 v1(2162.09,2563.98)
ADC_SYNC_N: R403.2 U300.5 U400.14 | length 2118.5
  Bottom Layer w7.87: R403.2@1676.57,1572.83 1677.83,1572.83 1673.9,1576.77 1673.9,1812.99 1669.96,1816.93 1669.96,1860.24 1666.02,1864.17 1666.02,1868.11 1630.59,1903.54 1630.59,1907.48 1591.22,1946.85 1591.22,2001.97 1587.28,2005.91 1587.28,2045.28 1583.35,2049.21 1583.35,2057.09 1579.41,2061.02 1579.41,2064.96 1571.54,2072.83 1536.1,2072.83 1532.17,2076.77 U400.14@1532.17,2075.79 1603.03,2146.65 1606.97,2146.65 1630.59,2170.28 1634.53,2170.28 1646.34,2182.09 1654.21,2182.09 1673.9,2201.77 1697.52,2201.77 1740.83,2245.08 1882.56,2245.08 1921.93,2284.45 2079.41,2284.45 2158.15,2363.19 2197.52,2363.19 2205.39,2371.06 2205.39,2375 2209.33,2378.94 2209.33,2666.34 2229.02,2686.02 2229.02,2689.96 2248.7,2709.65 2248.7,2713.58 2268.39,2733.27 2268.39,2737.2 2280.2,2749.02 2280.2,2752.95 2299.88,2772.64 2299.88,2776.57 2319.57,2796.26 2319.57,2800.2 2339.25,2819.88 2339.25,2823.82 2358.94,2843.5 2358.94,2847.44 2378.62,2867.13 2378.62,2871.06 2394.37,2886.81 2394.37,2890.75 2414.06,2910.43 2414.06,2914.37 2433.74,2934.06 2433.74,2937.99 2484.92,2989.17 U300.5@2484.65,2990.94
ADJ_NEG: R212.2 R213.1 U211.1 | length 785.8
  Top Layer w7.87: v3(4176.52,1502.03) 4143.11,1535.43 4167.78,1535.43 4167.78,1523.09 4183.58,1507.3 4271.14,1507.3 4286.94,1523.1 4286.94,1535.43 v3(4311.61,1535.43) 4311.61,1563.06 4322.67,1574.11 4322.67,1889.76 U211.1@4370.08,1889.76
  Bottom Layer w7.87: R213.1@4143.11,1535.43 v3(4176.52,1502.03) ; R212.2@4311.61,1456.69 v3(4311.61,1535.43)
ADJ_POS: R210.2 R211.1 U210.1 | length 765.5
  Top Layer w7.87: R211.1@4025,2007.87 4025,2035.5 4129.67,2140.17 4248,2140.17 ; v3(4240.75,1998.03) 4203.35,1998.03 4228.02,1998.03 4248,2018.01 4248,2140.17 ; U210.1@4370.08,2283.46 4322.67,2283.46 4248,2208.79 4248,2140.17
  Bottom Layer w7.87: R210.2@4203.35,1998.03 v3(4240.75,1998.03)
ARM_REQUEST: R1011.2 U300.10 | length 1252.2
  GND L3 w5.91: v1(2443.5,1525.59) 2463.19,1545.28 2502.56,1545.28 2506.5,1549.21 2510.43,1549.21 2526.18,1564.96 2526.18,1568.9 2530.12,1572.83 2530.12,1624.02 2541.93,1635.83 2541.93,1639.76 2545.87,1643.7 2545.87,2423.23 2526.18,2442.91 2526.18,2446.85 2482.87,2490.16 U300.10@2484.65,2490.94
  Bottom Layer w5.91: v1(2443.5,1525.59) 2439.57,1521.65 2439.57,1474.41 2443.5,1470.47 2443.5,1466.54 2447.44,1462.6 2447.44,1458.66 2455.31,1450.79 2455.31,1419.29 2471.06,1403.54 R1011.2@2471.06,1348.43